# Altium PCB Karta_ILS.PCBDOC (part 1 of 9)
Units mm, origin at the board's own origin, x right, y up, seen from the top; angles counter-clockwise.
Board outline 70 x 83.2 mm, 6 copper layers (TopLayer, Layer 1, Layer 2, Layer 3, Layer 4, Bottom Layer), stack 0.914 mm thick; 406 components, 271 nets, 1327 pads, 719 vias.
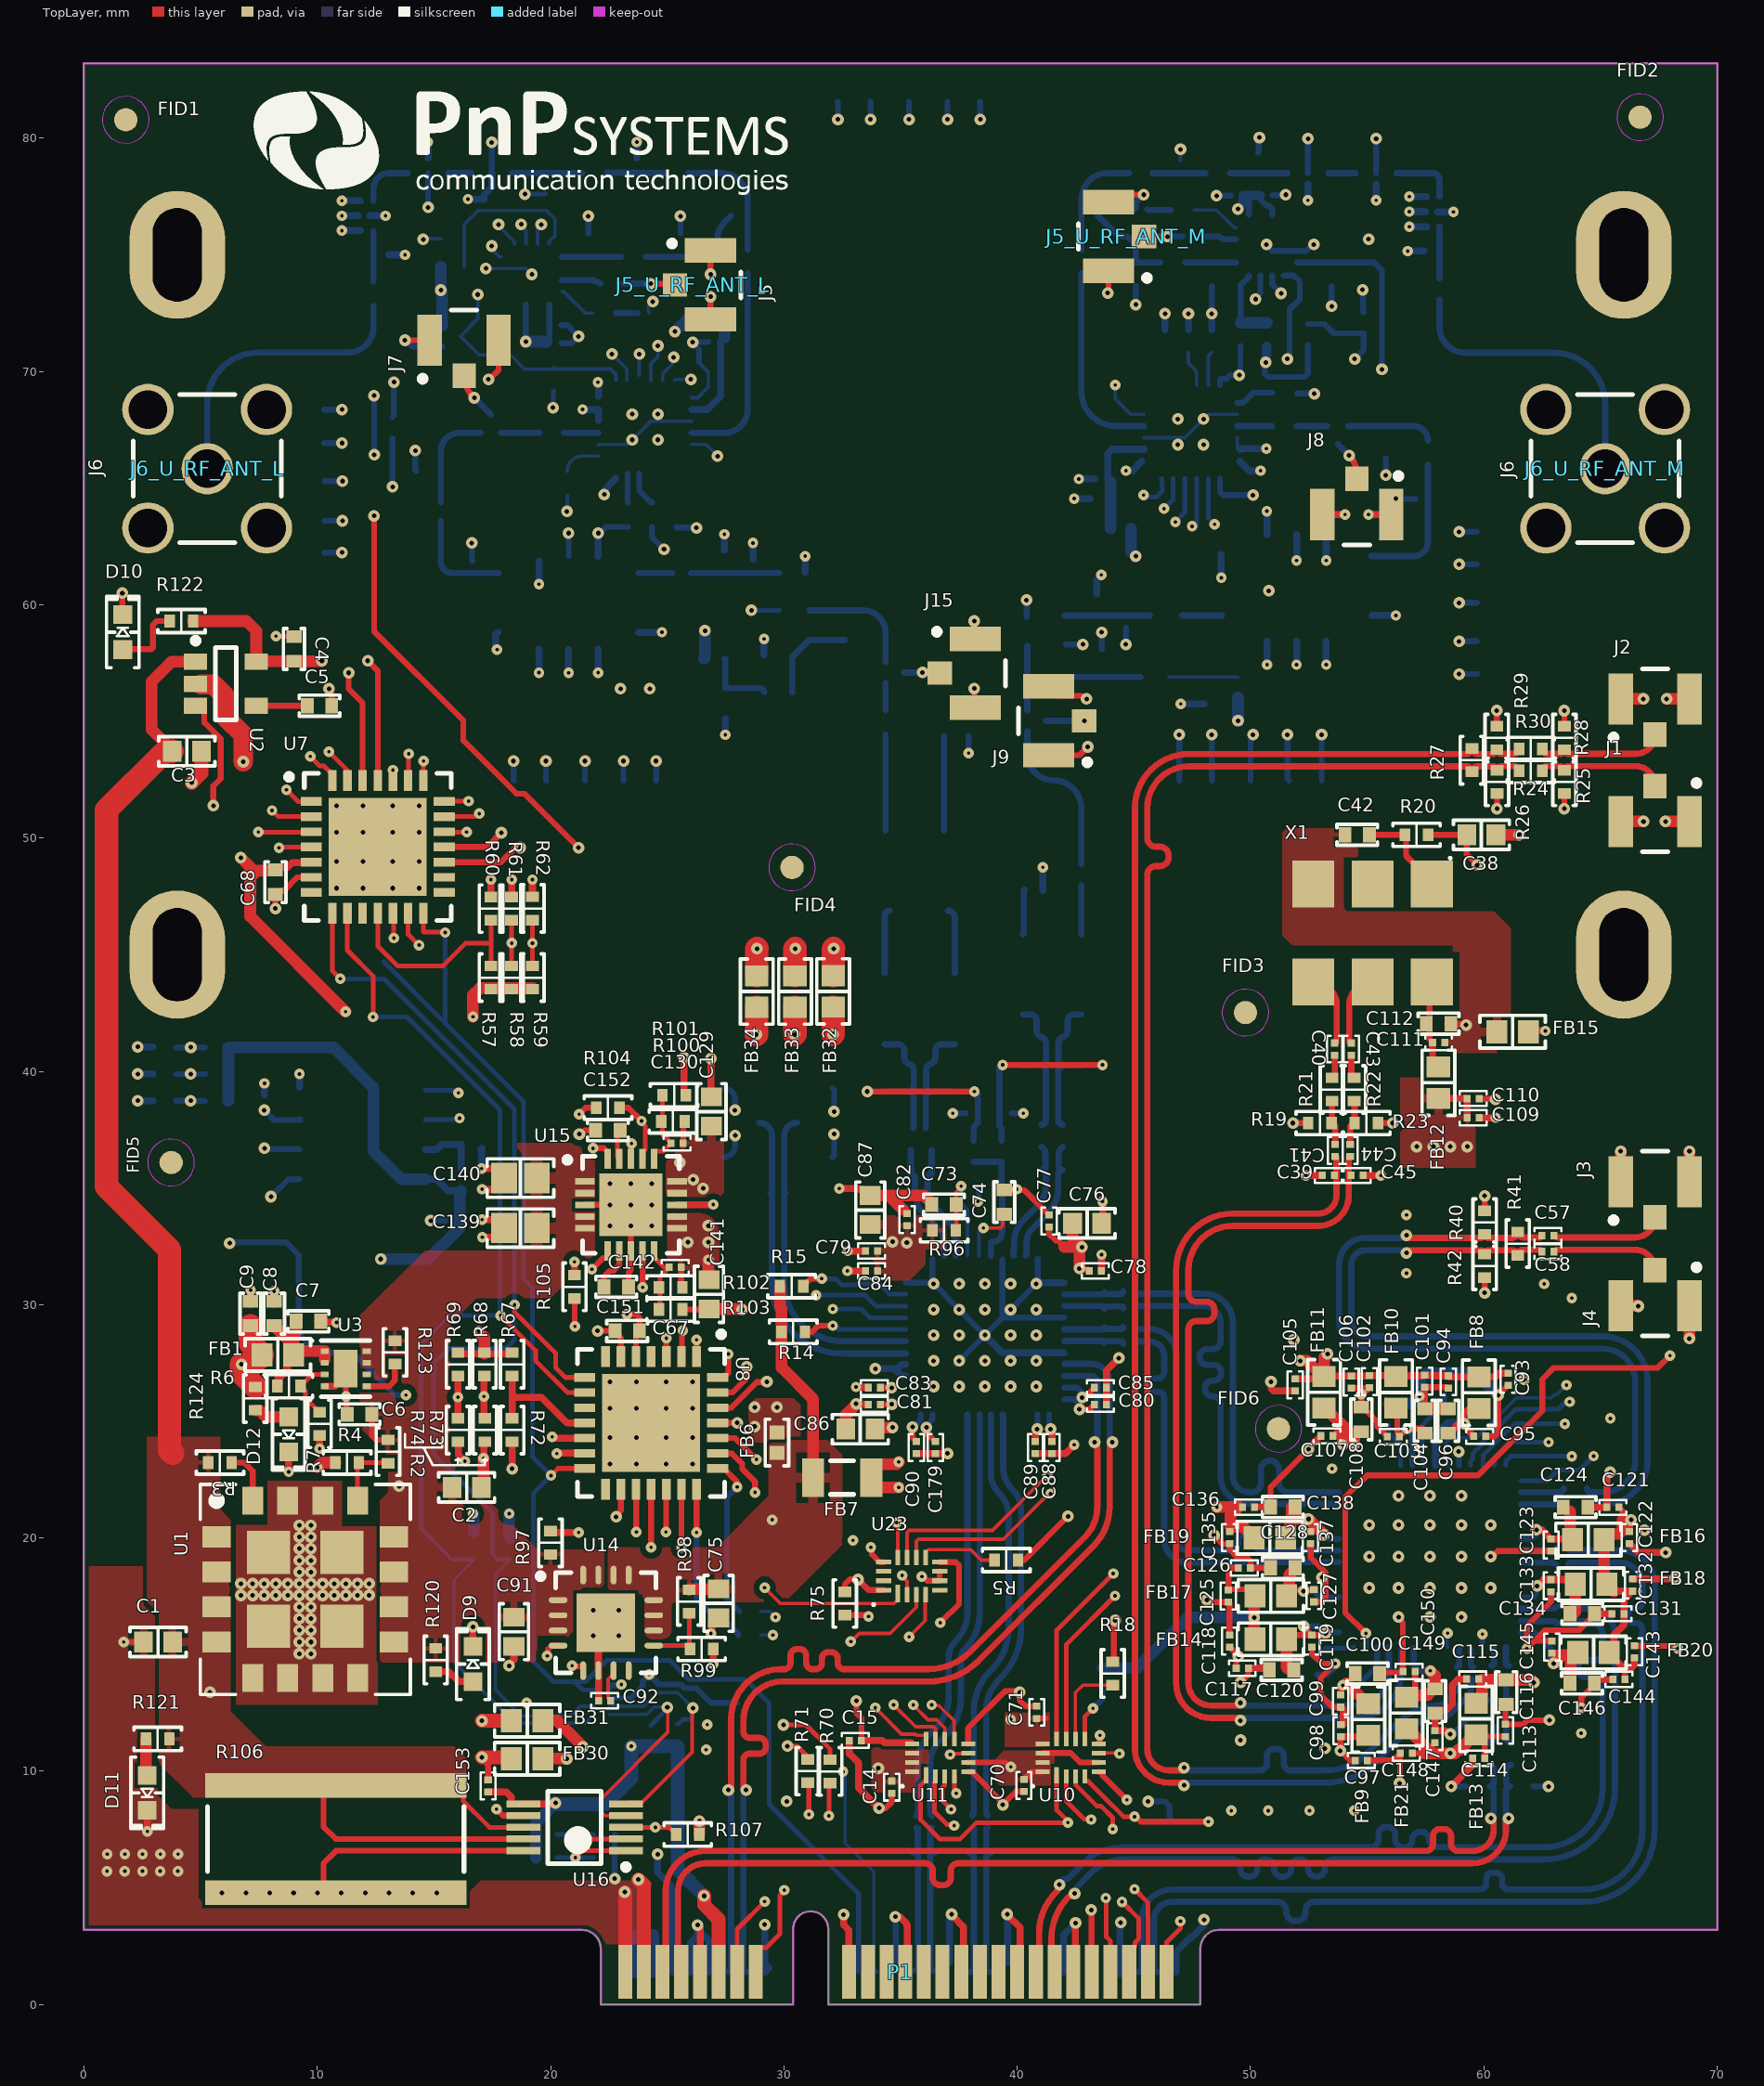
[diagram p0: TopLayer view]
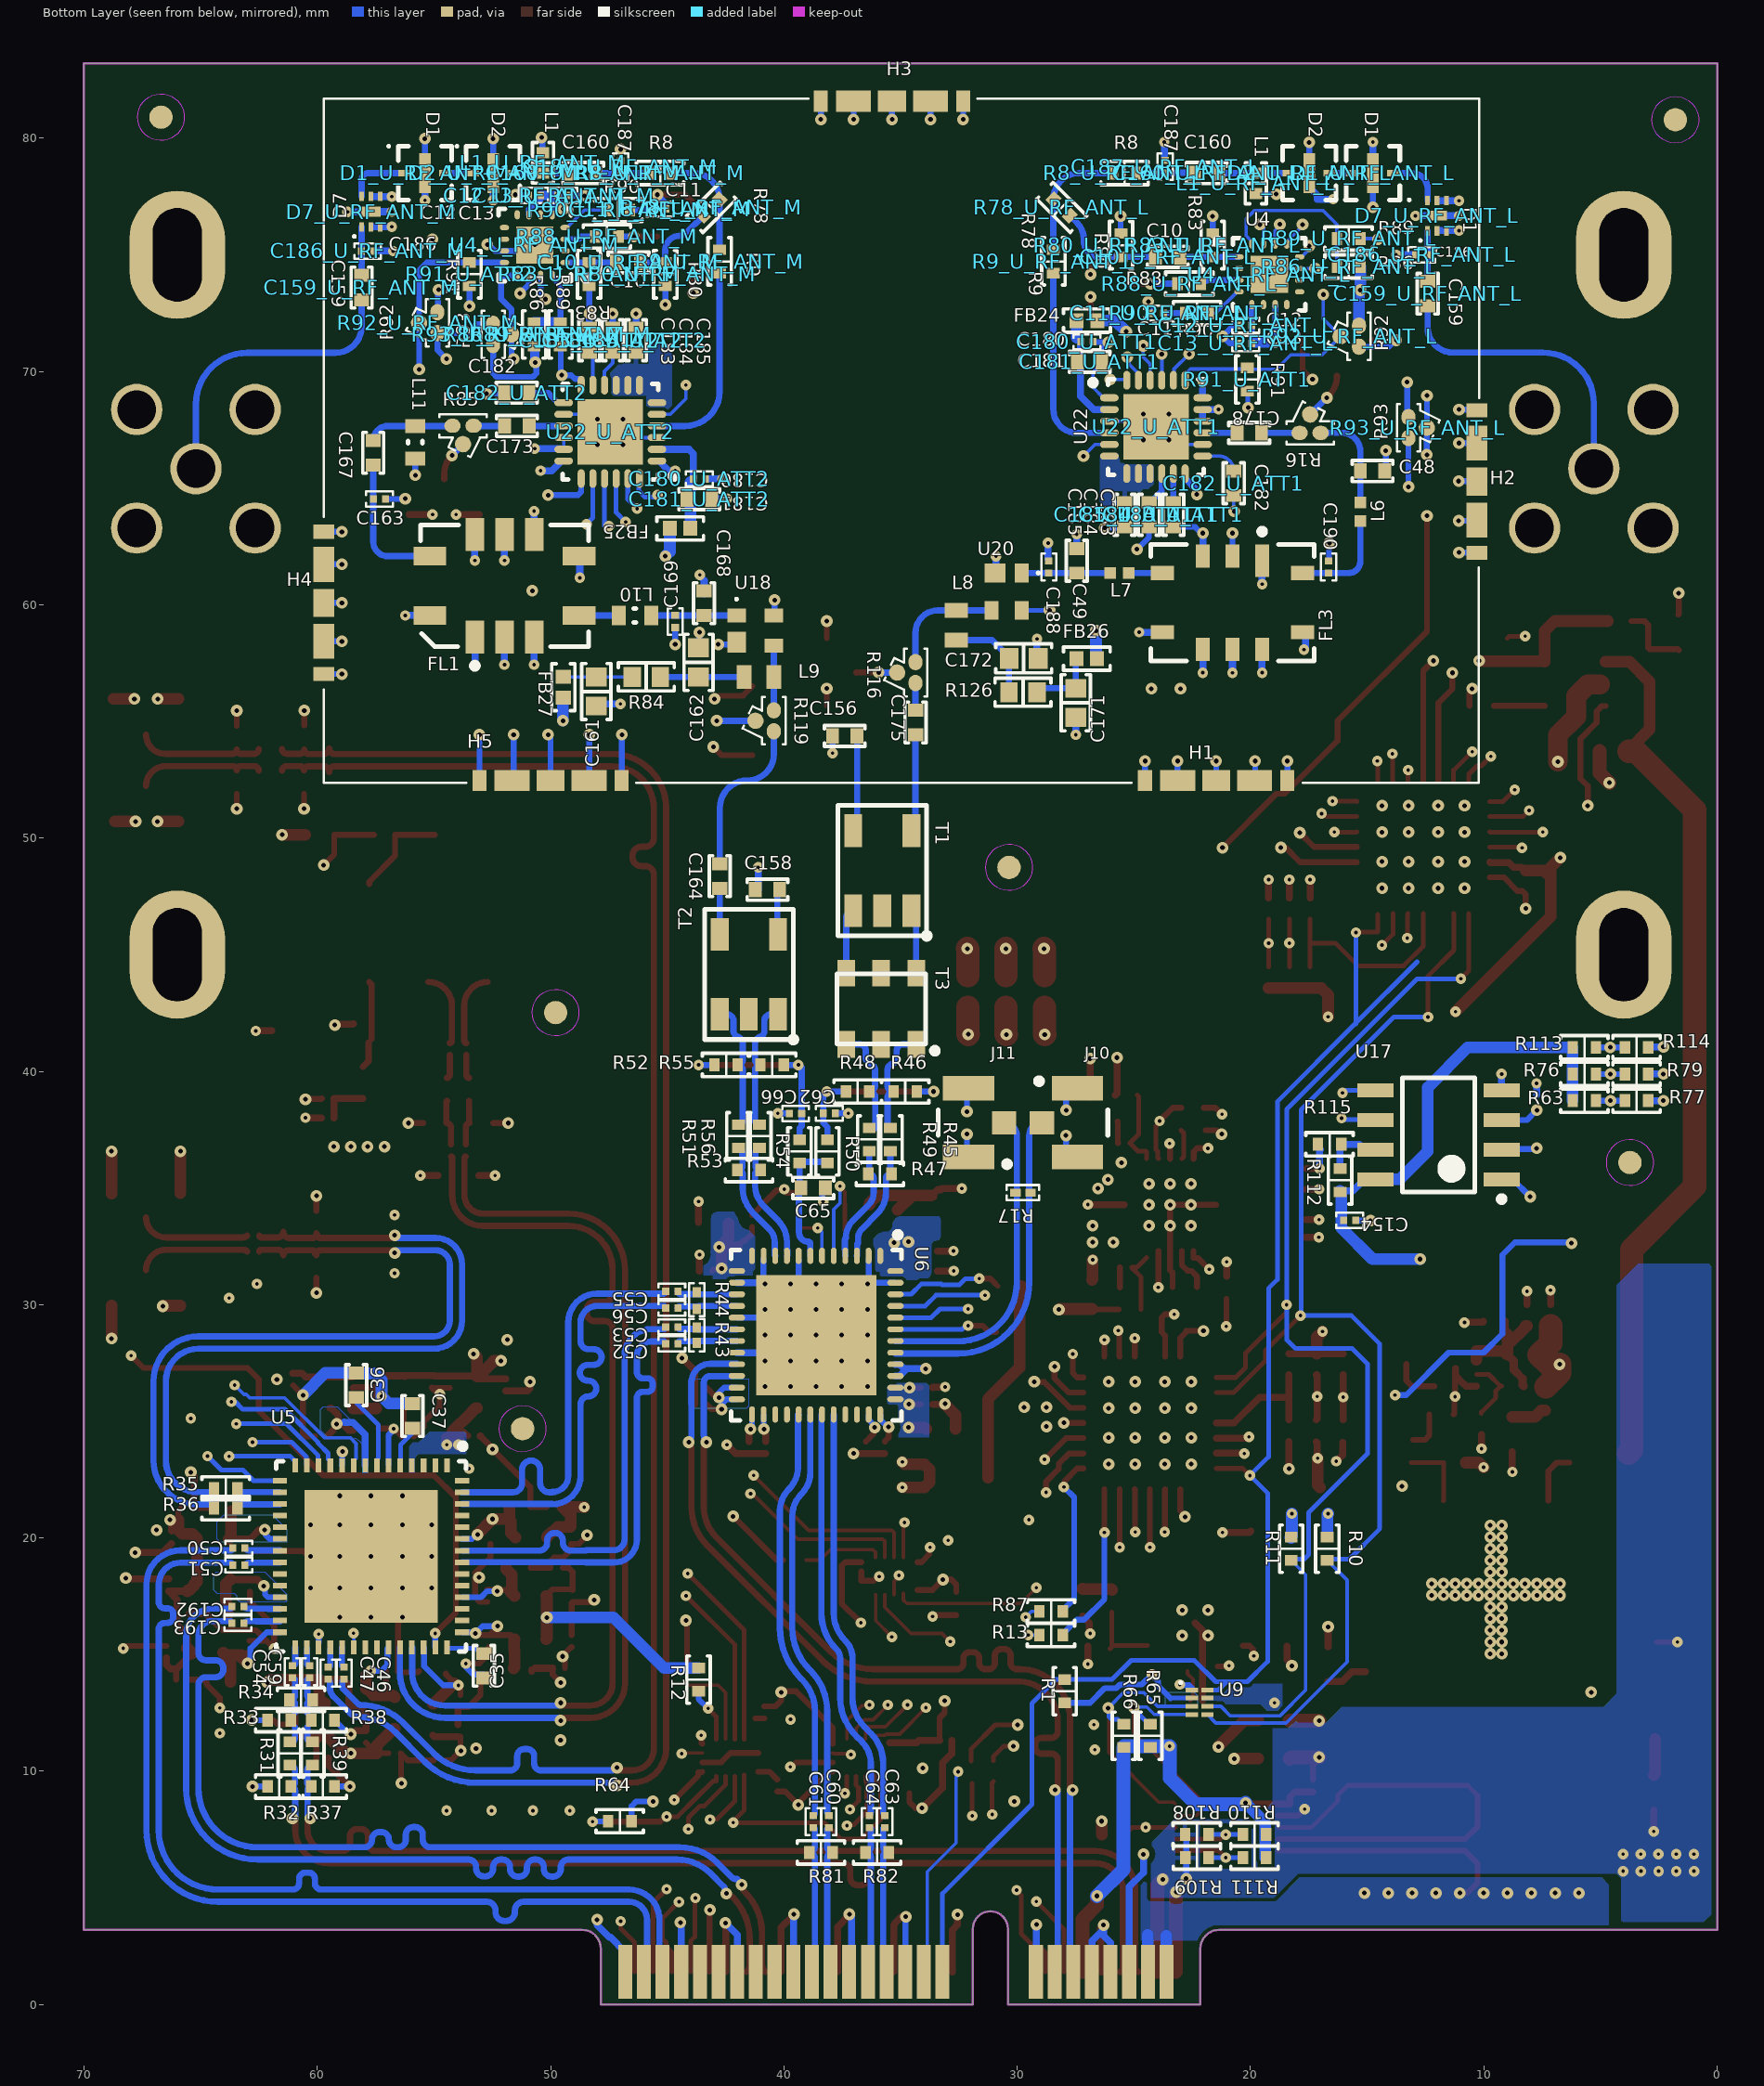
[diagram p1: Bottom Layer view, seen from below]
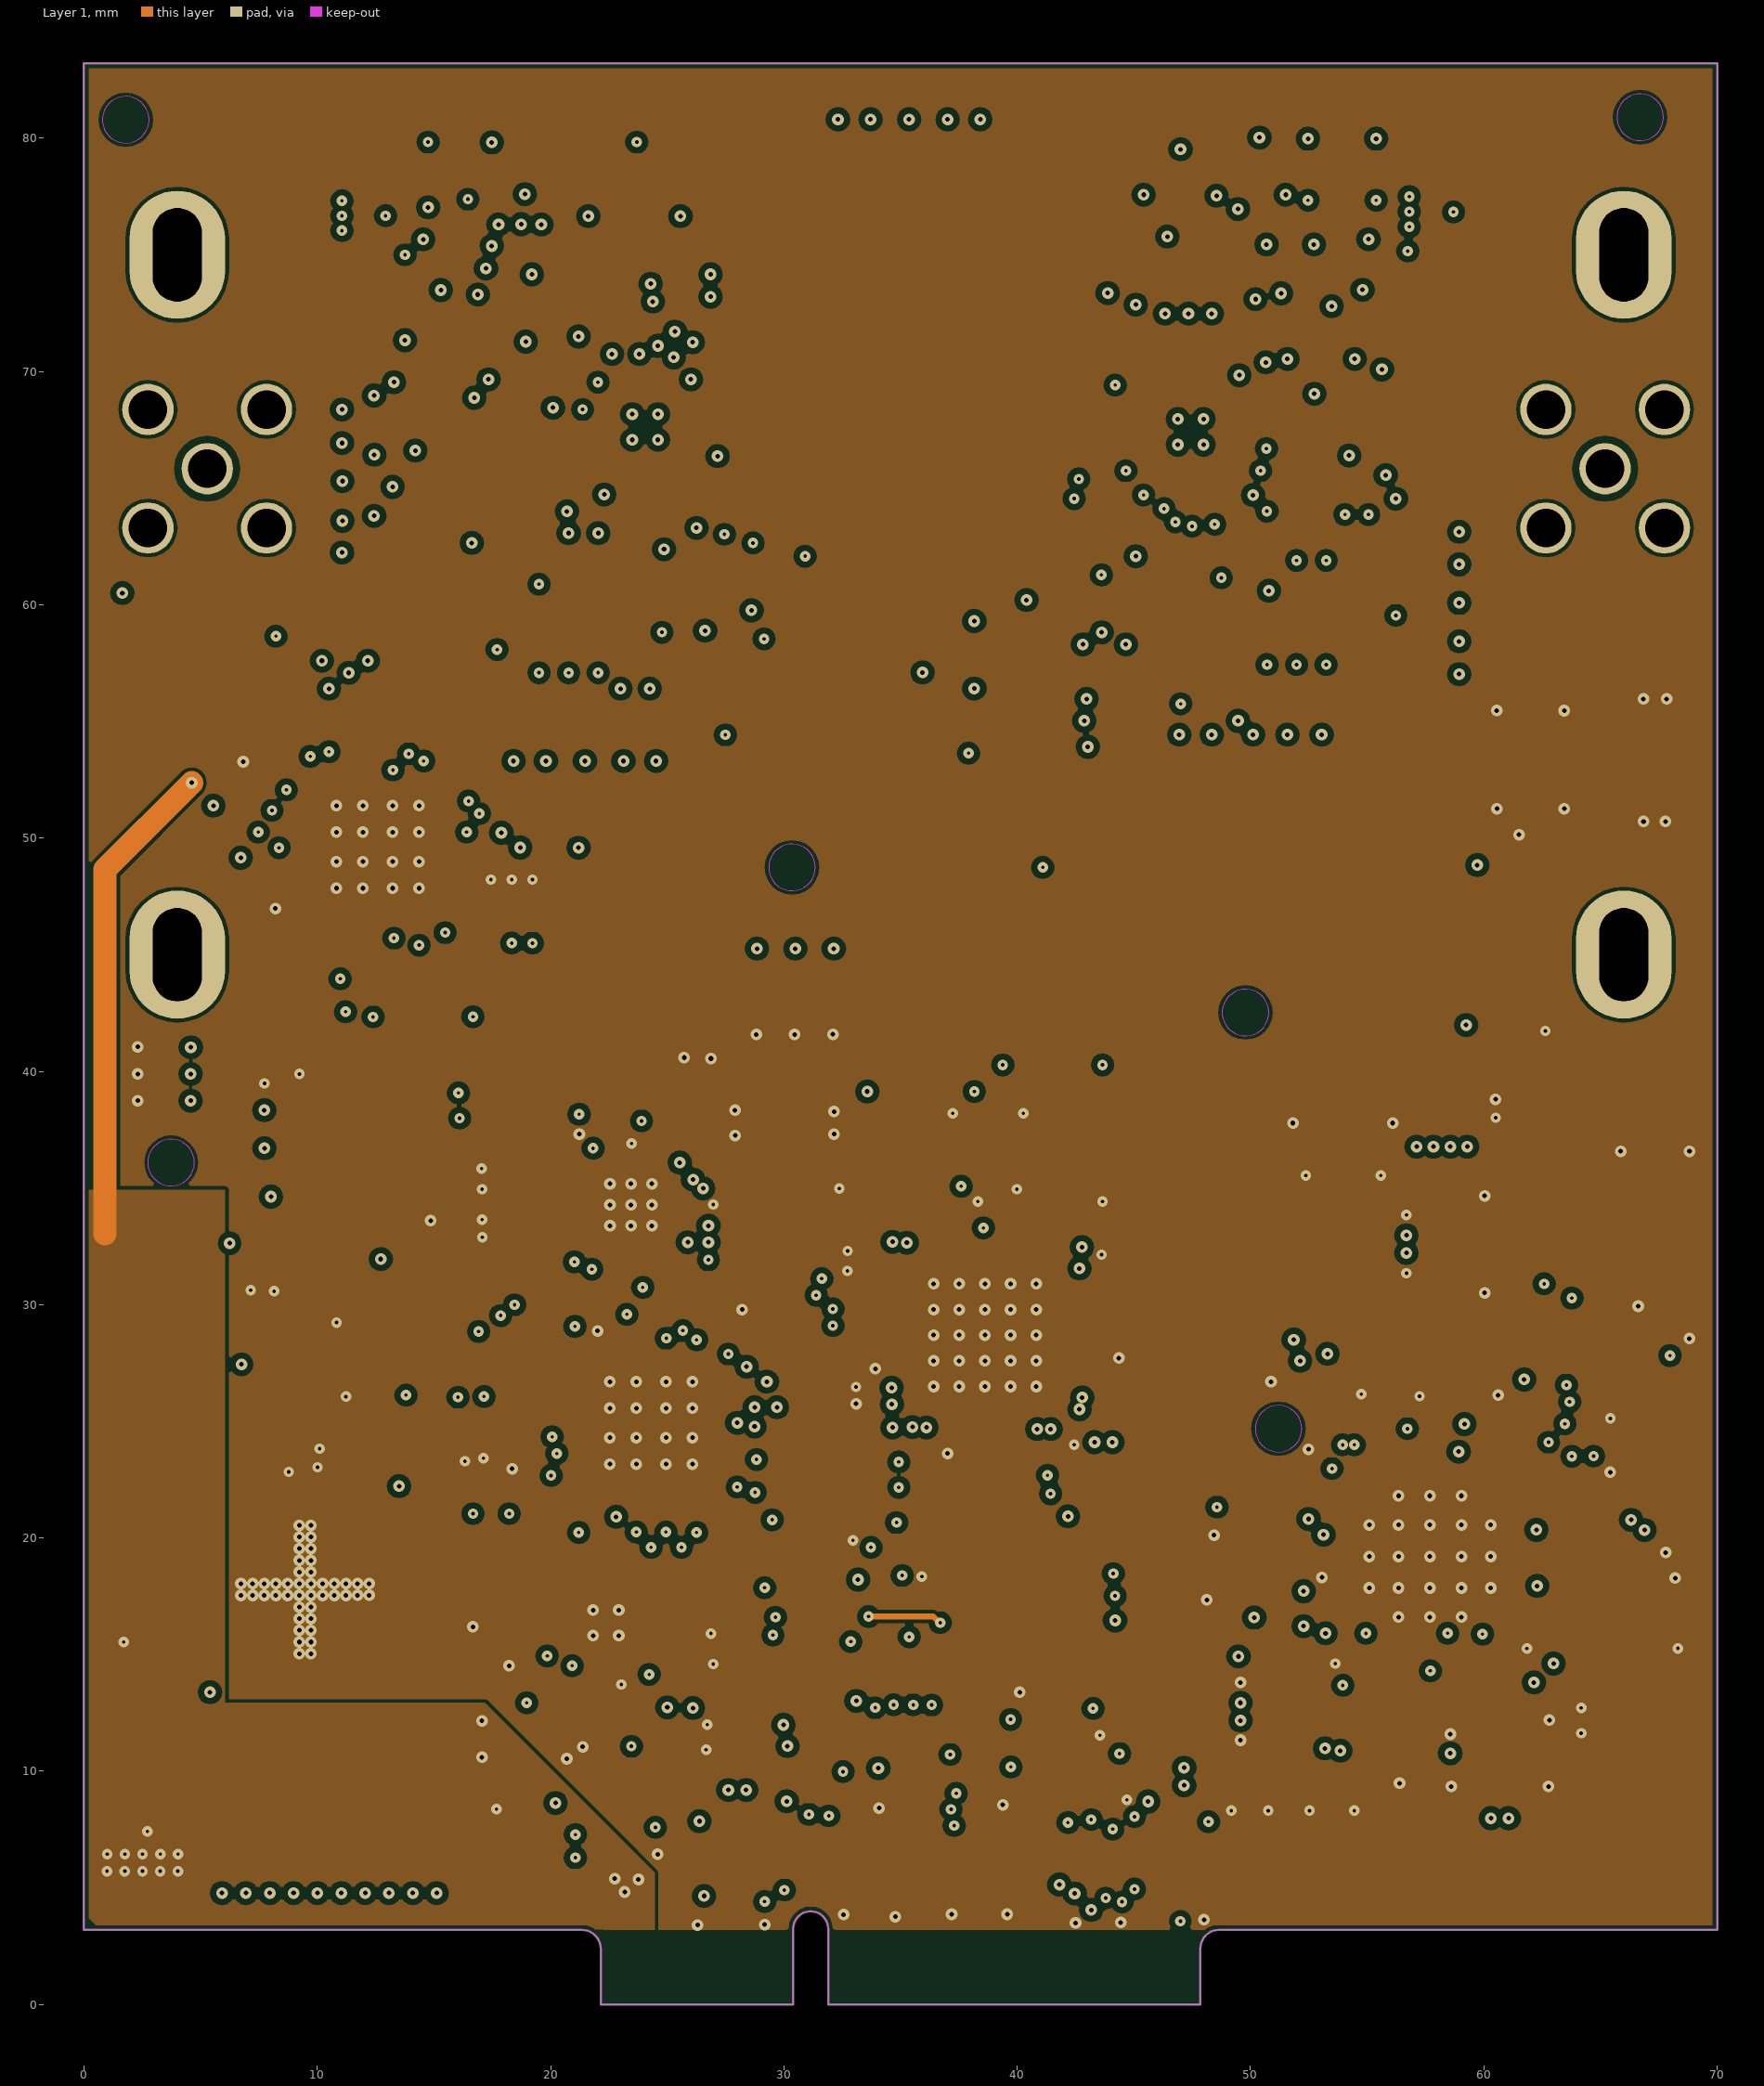
[diagram p2: Layer 1]
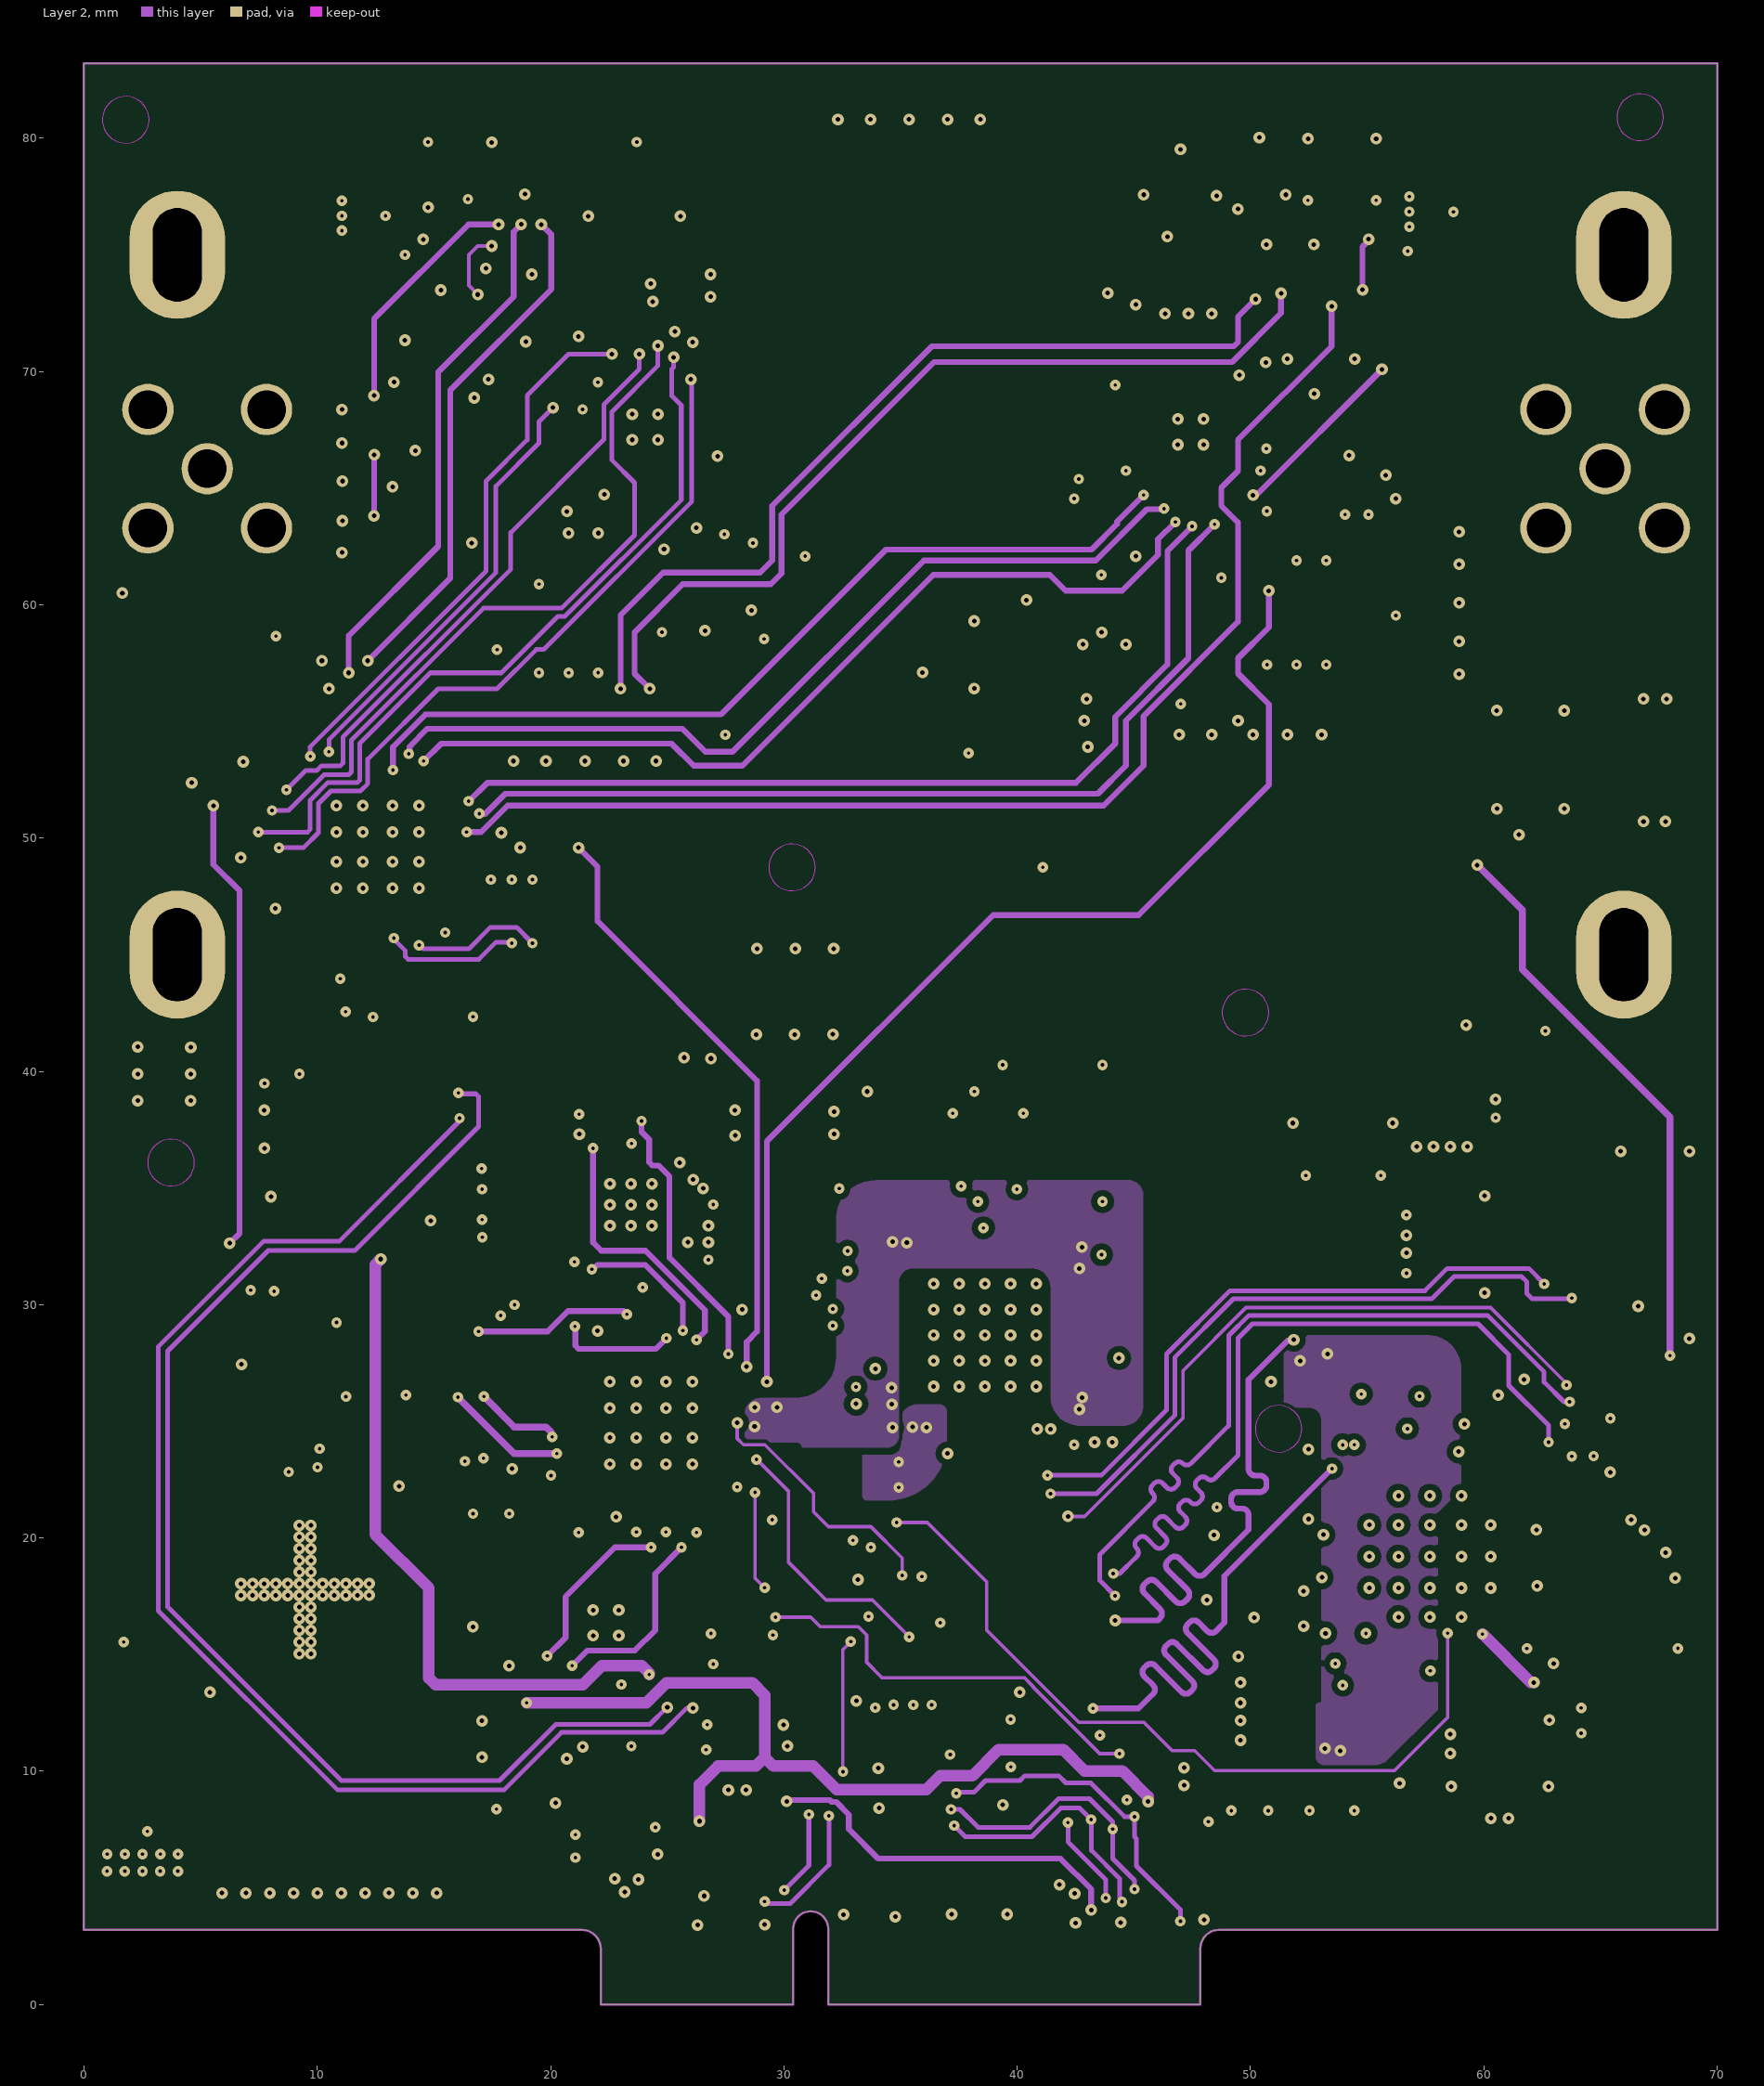
[diagram p3: Layer 2]
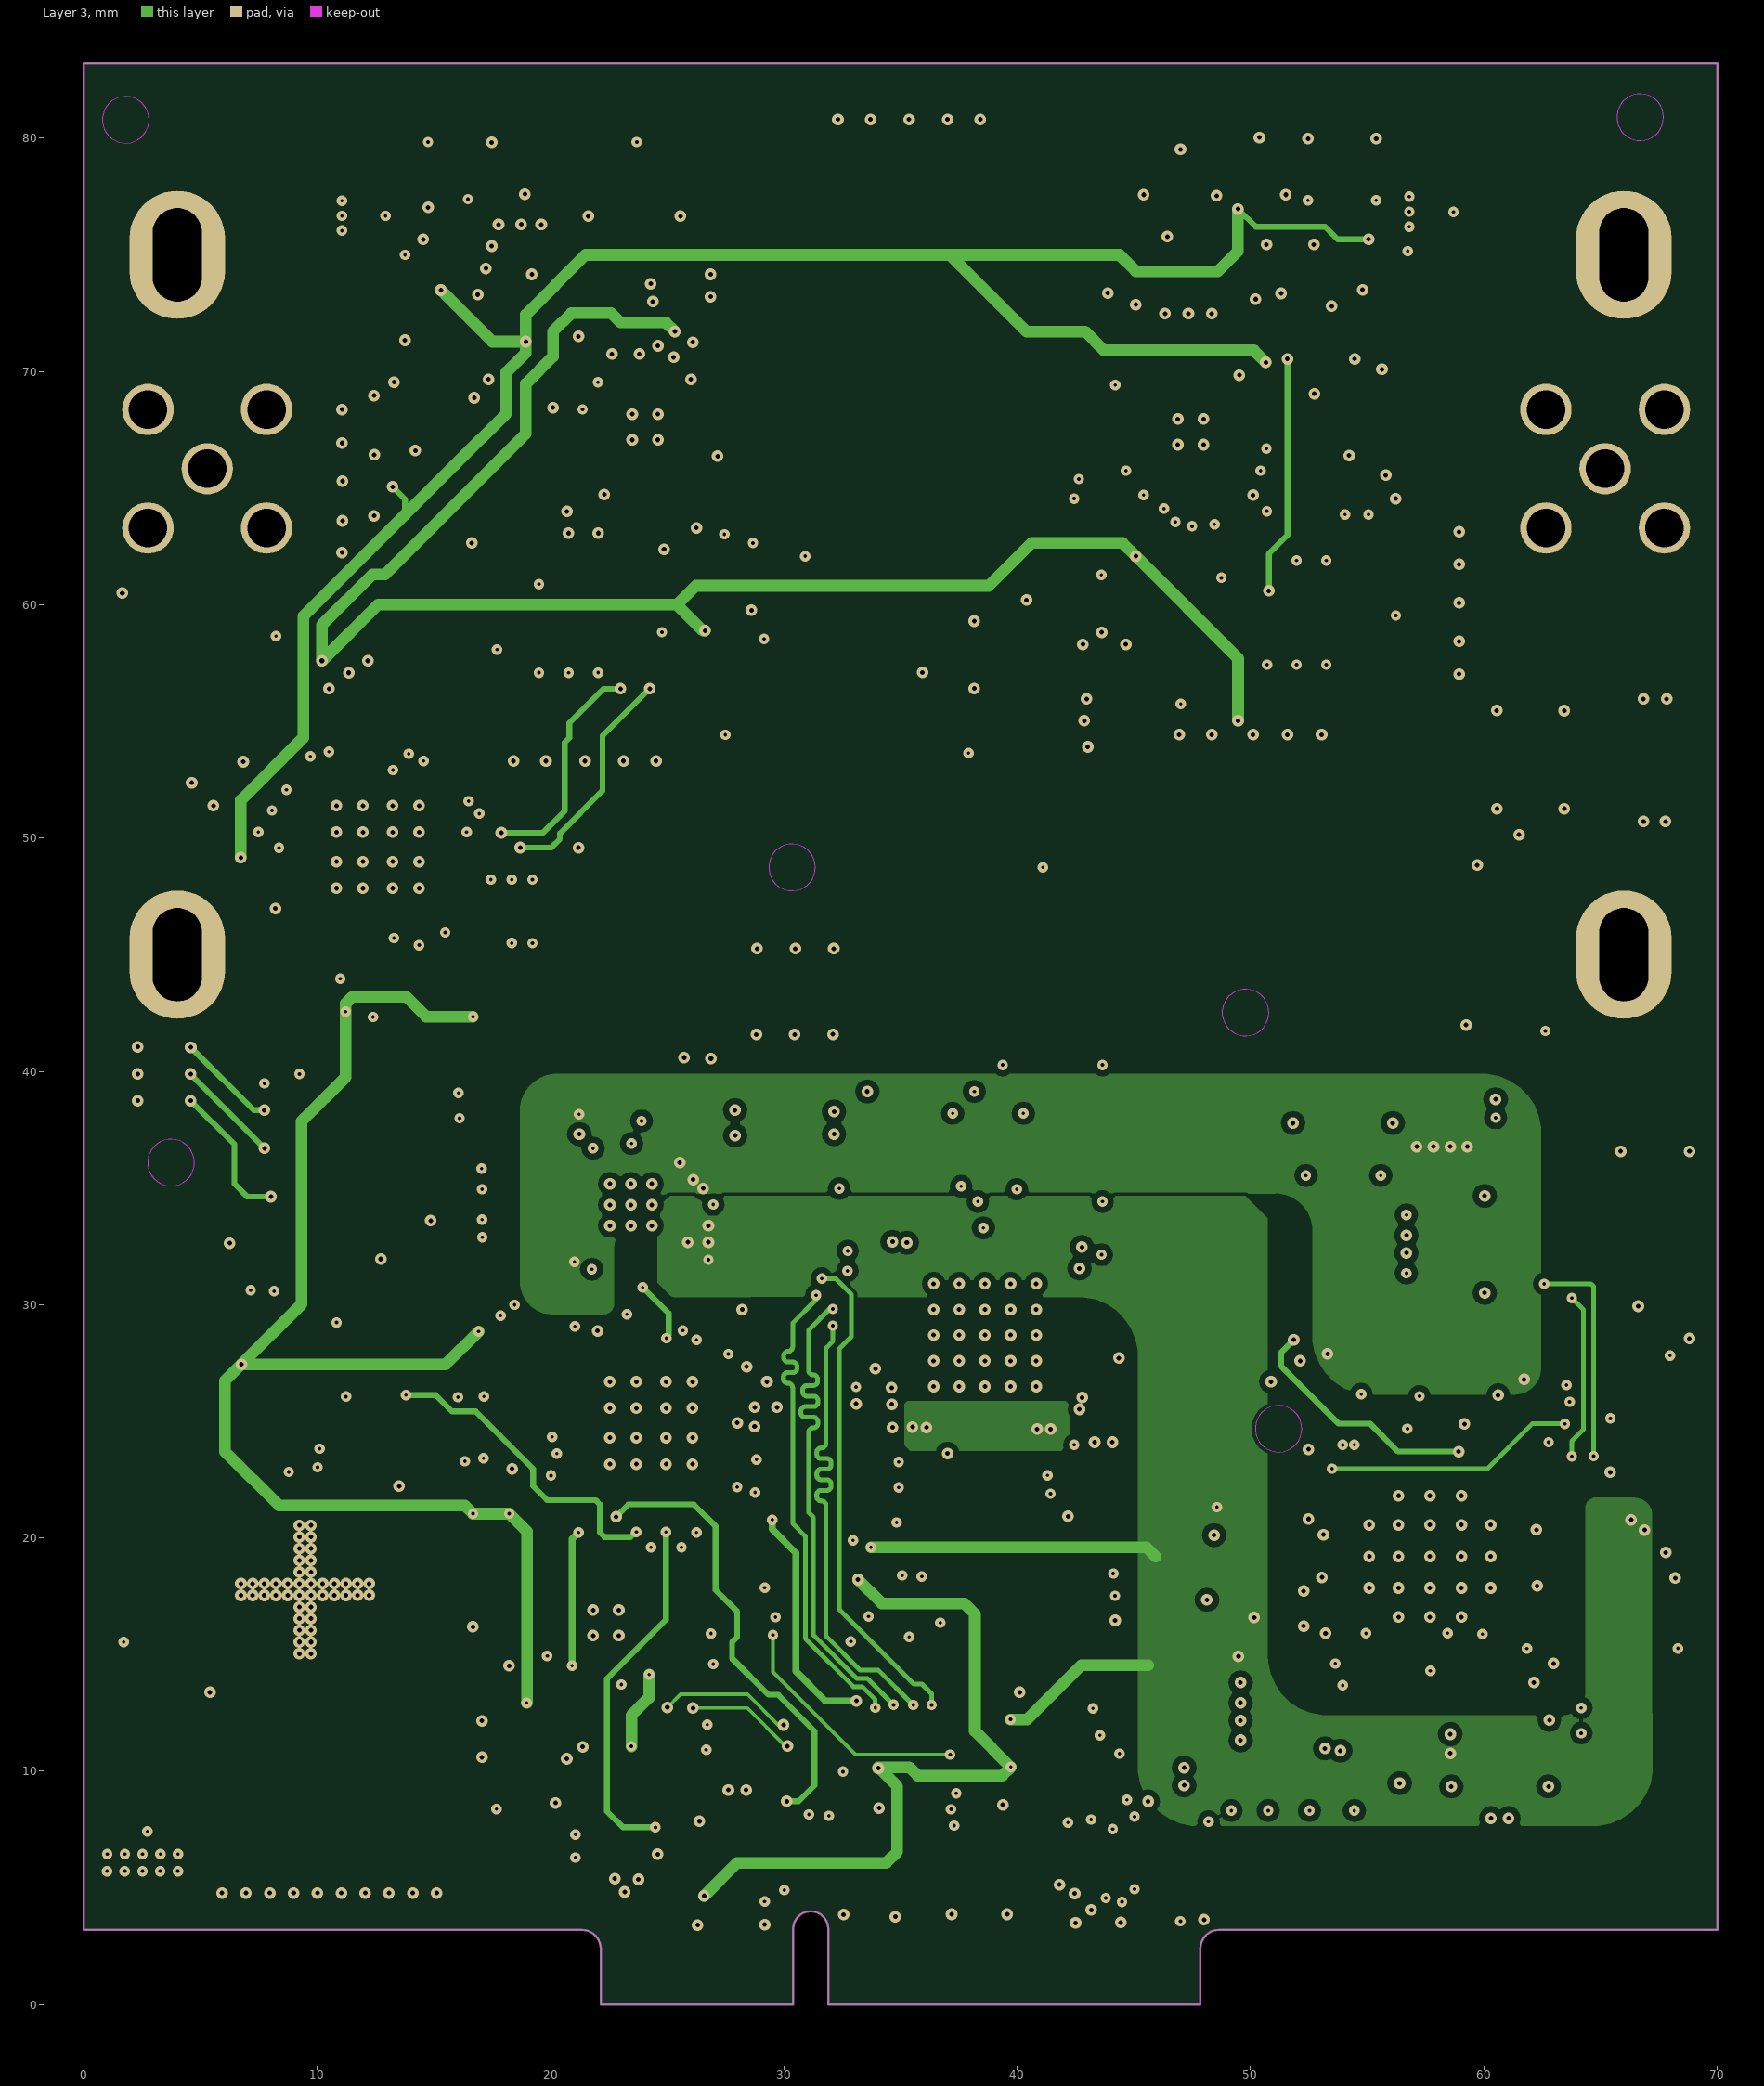
[diagram p4: Layer 3]
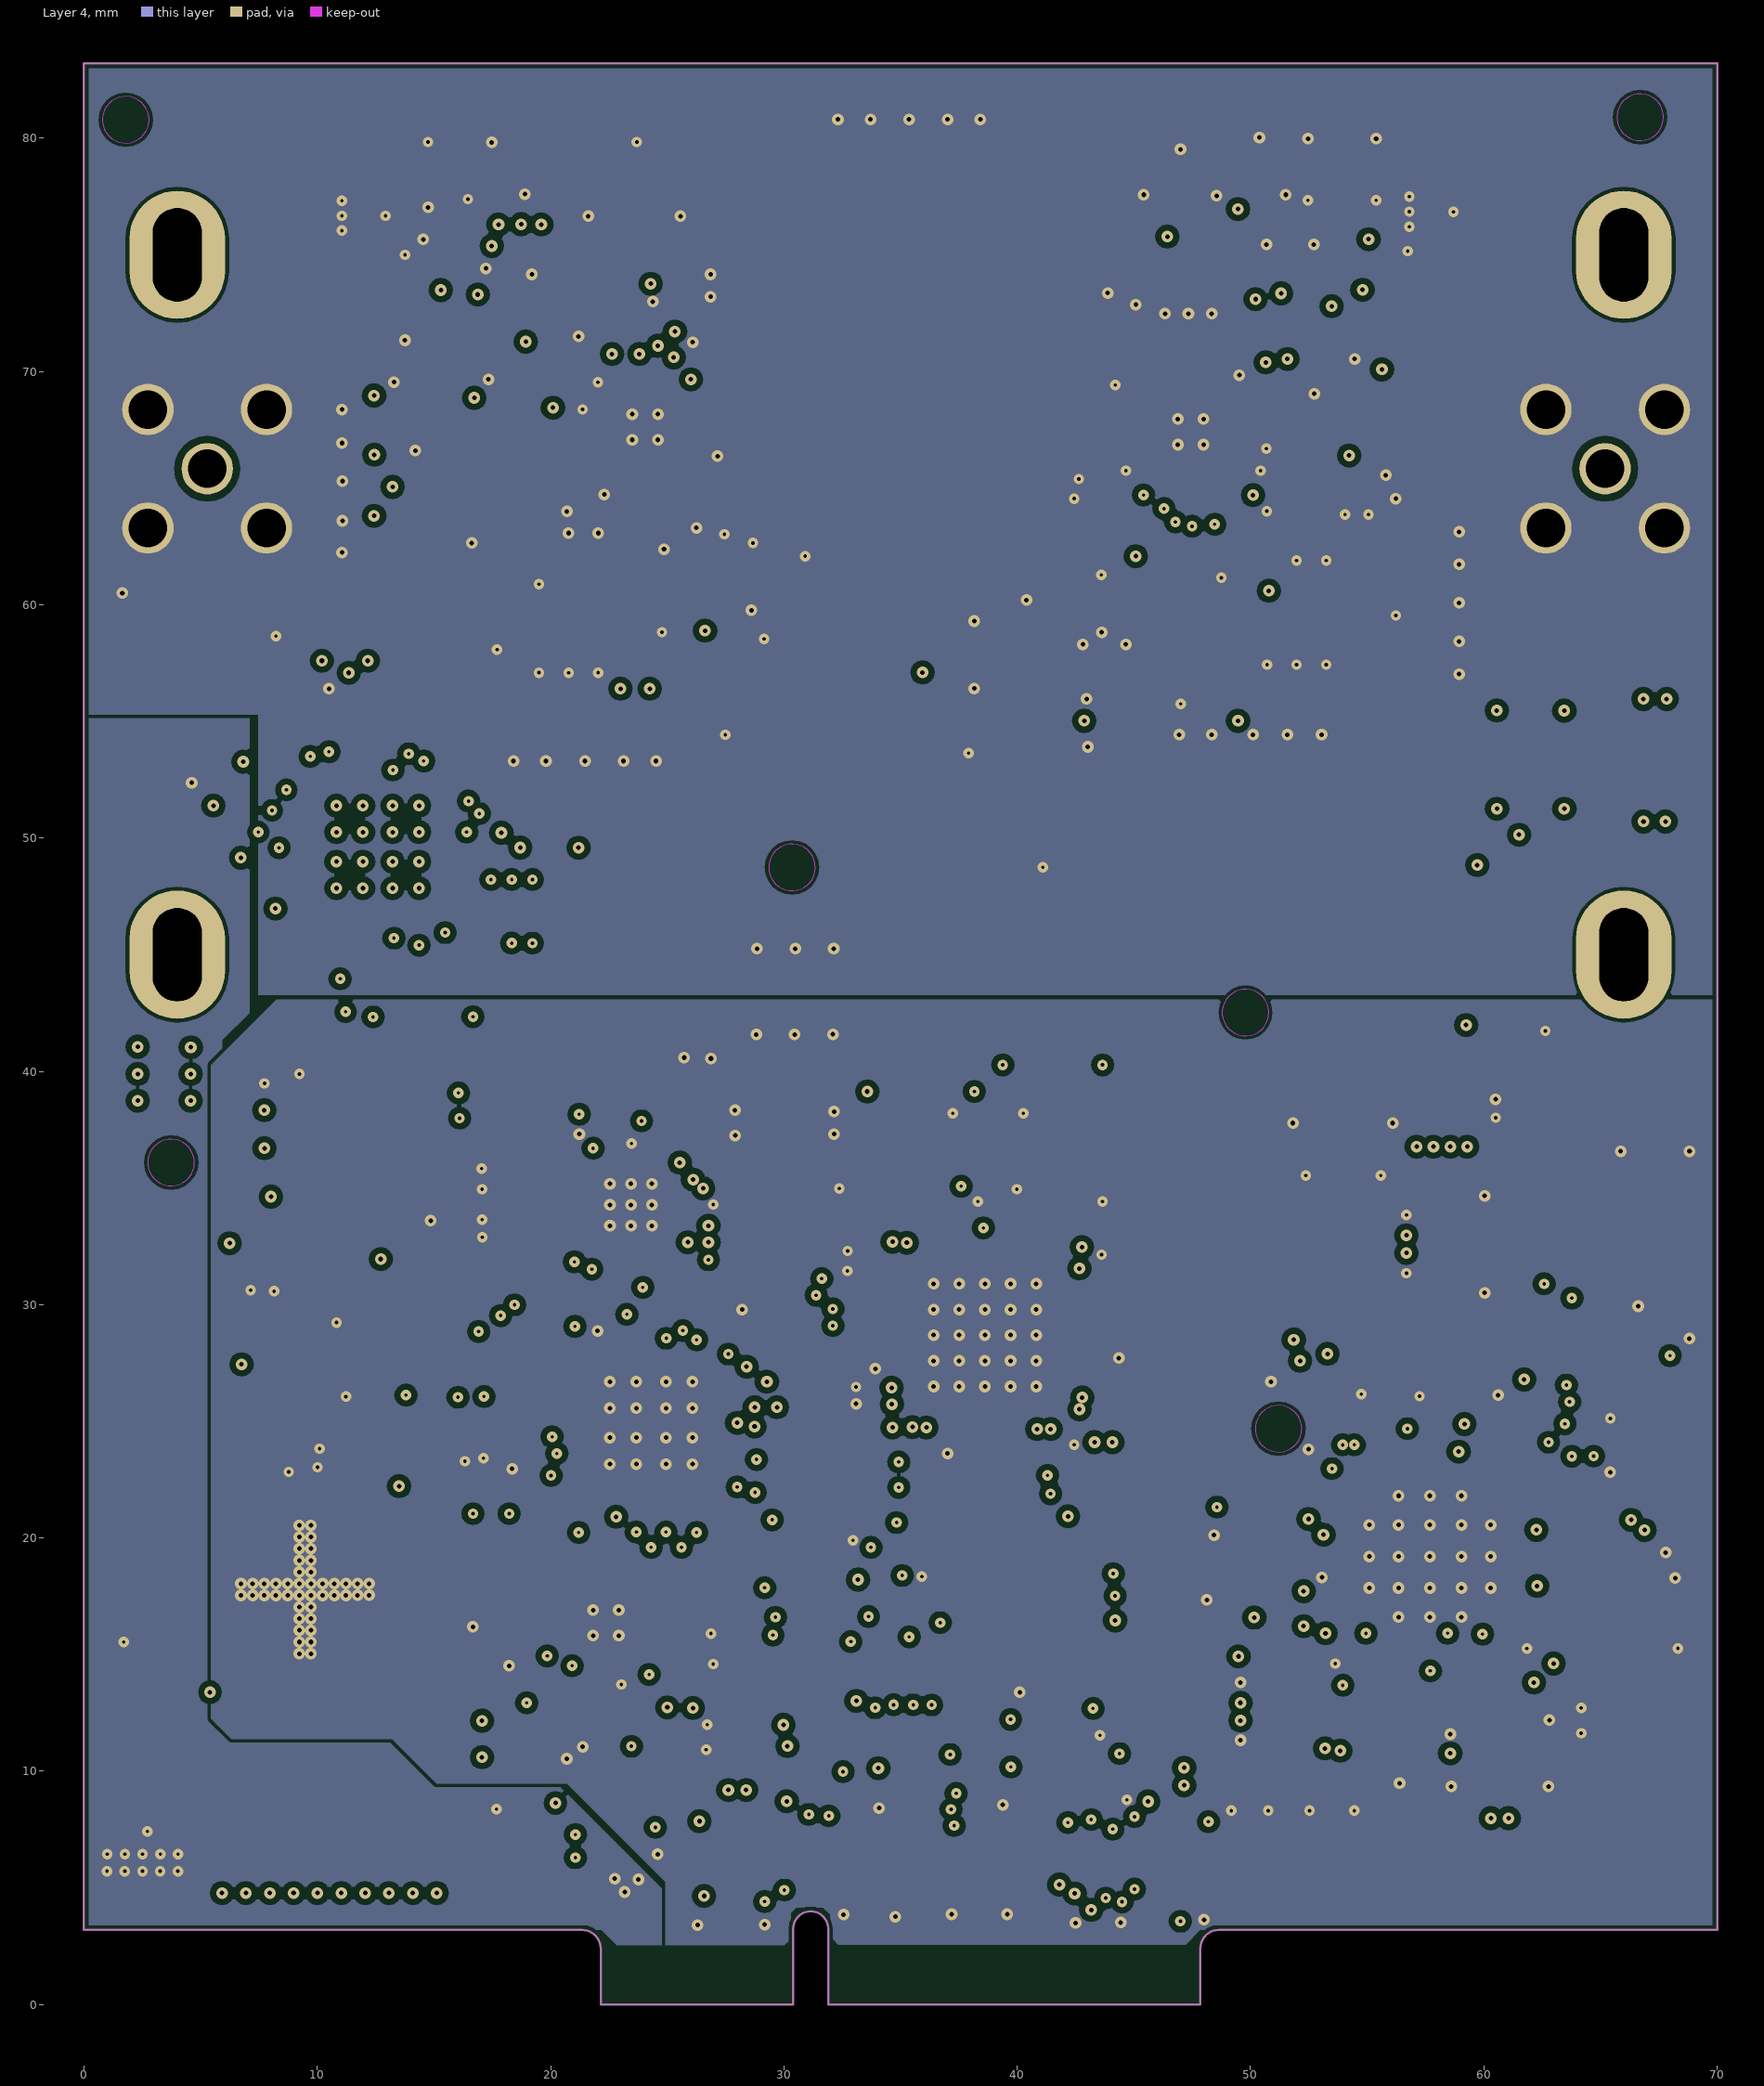
[diagram p5: Layer 4]

## Layer stack, top to bottom
TopSolder: solder mask 0.01, Solder Resist, Dk 3.5
TopLayer: signal copper 0.017
Dielectric1: prepreg 0.16, PP-008, Dk 4.29
Layer 1: signal copper 0.053
Dielectric 2: core 0.094, Core-009, Dk 3.96
Layer 2: signal copper 0.053
Dielectric2: prepreg 0.16, PP-016, Dk 4.29
Layer 3: signal copper 0.053
Dielectric 3: core 0.094, Core-009, Dk 3.96
Layer 4: signal copper 0.053
Dielectric 1: prepreg 0.16, PP-008, Dk 4.29
Bottom Layer: signal copper 0.017
Bottom Solder: solder mask 0.01, Solder Resist, Dk 3.5

## Board outline
22.15,2.4 ccw(c21.35,2.4) 21.35,3.2 0,3.2 0,83.2 70,83.2 70,3.2 48.65,3.2 ccw(c48.65,2.4) 47.85,2.4 47.85,0 31.9,0 31.9,3.25 ccw(c31.15,3.25) 30.4,3.25 30.4,0 22.15,0

## Design rules (kind name [scope] priority, off if disabled: settings)
Clearance Clearance_Via [IsVia] p1: gap=0.1 ignorepadtopadclearanceinfootprint=FALSE except(0.26: Arc-Via Track-Via Via-Via Via-Fill Via-Poly Via-Region; 0.5: Arc-Arc Arc-Track Track-Track)
Clearance Clearance_diff [InAnyDifferentialPair] p2: gap=0.5 ignorepadtopadclearanceinfootprint=TRUE except(0.2: Arc-Arc Arc-Track Arc-SMDPad Track-Track Track-SMDPad SMDPad-SMDPad; 0.26: Via-Via Via-Fill Via-Poly Via-Region)
Clearance Clearance_50 [InNetClass('Single50')] p3: gap=0.3 ignorepadtopadclearanceinfootprint=TRUE except(0.15: Arc-SMDPad Track-SMDPad; 0.25: Arc-Arc Arc-Track Track-Track)
Clearance "Clearance_Edge Connector" [(InComponentClass('Edge Connector')) vs (InComponentClass('Edge Connector'))] p4: gap=0.2 ignorepadtopadclearanceinfootprint=FALSE except(0: Arc-Hole Track-Hole SMDPad-Hole THPad-Hole Via-Hole Fill-Hole Poly-Hole Region-Hole Text-Hole)
Clearance [All] p5: gap=0.15 ignorepadtopadclearanceinfootprint=FALSE
DiffPairsRouting Diff_100 [InDifferentialPairClass('Diff_100')] p1: maxlimit=0.26 minlimit=0.23 mostfreqgap=0.254 toplayer_mingap=0.26 toplayer_prefgap=0.26 toplayer_minwidth=0.268 toplayer_maxwidth=0.268 toplayer_prefwidth=0.268 bottomlayer_mingap=0.26 bottomlayer_prefgap=0.26 bottomlayer_minwidth=0.268 bottomlayer_maxwidth=0.268 bottomlayer_prefwidth=0.268 impedanceprofiledriven=TRUE impedanceprofileid={4EC12C71-731A-4A04-9E39-5B54F8BA15AE} impedanceprofilevalue=100.000000 maxuncoupledlength=12.7
FabricationTestPointUsage TestPointUsage [All] p1: valid=0 allowmultiple=FALSE
FabricationTestpoint Testpoint [All] p1: side=3 testpointundercomponent=TRUE minsize=1.016 maxsize=2.54 preferedsize=1.524 minholesize=0.508 maxholesize=1.016 preferedholesize=0.813 testpointgrid=0.025 allowsidetop=TRUE allowsidebottom=TRUE usegrid=TRUE gridtolerance=0
Height "PCI Express Mini, \"Component height constraints\", Page 18, bottom side" [OnBottomLayer] p1: minheight=0 maxheight=3.3 prefheight=3.3
Height "PCI Express Mini, \"Component height constraints\", Page 18, top side" [OnTopLayer] p2: minheight=0 maxheight=4 prefheight=4
Length ADC_CLK_SYS_DISTR [InDifferentialPair('CLKout10') or InDifferentialPair('CLKout8')] p1: maxlimit=18.5 minlimit=17.5
Length FPGA_CLK [InNetClass('FPGA_CLK')] p2: maxlimit=42 minlimit=41
Length ADC_DATA_OUT_TO_CAP_1 [InDifferentialPair('CMLOUT_AC') or InDifferentialPair('CMLOUT_BC')] p3: maxlimit=17.9 minlimit=17.2
MatchedLengths MatchedLengths_CLK [InDifferentialPair('LMK_OSC_IN') or InDifferentialPair('CLKout1_C') or InDifferentialPair('CLKin0P') or InDifferentialPair('CLKin1') or InDifferentialPair('0F')] p1: tolerance=1 checknetsindiffpair=TRUE checkdiffpairvsdiffpair=FALSE checkxsignals=FALSE checkothers=FALSE
MatchedLengths [InNetClass('FPGA_CLK')] p2: tolerance=1 checknetsindiffpair=TRUE checkdiffpairvsdiffpair=FALSE checkxsignals=FALSE checkothers=FALSE
MatchedLengths DiffPair_ADC_TO_FPGA [InNetClass('Data_OUT_TO FPGA')] p3: tolerance=0.381 checknetsindiffpair=TRUE checkdiffpairvsdiffpair=FALSE checkxsignals=FALSE checkothers=FALSE
MatchedLengths DiffPair_ADC [InNetClass('Data_OUT_TO_CAP')] p4: tolerance=0.5 checknetsindiffpair=TRUE checkdiffpairvsdiffpair=FALSE checkxsignals=FALSE checkothers=FALSE
PlaneClearance [All] p1: clearance=0.5
PlaneConnect [All] p1: planeconnectstyle=Direct reliefexpansion=0.508 reliefentries=4 reliefconductorwidth=0.254 reliefairgap=0.254
PolygonConnect "Connect Res0201" [HasFootprint('RES 0201/0603')] p1: thpad.connectstyle=Direct thpad.reliefconductorwidth=0.254 thpad.reliefentries=4 thpad.polygonreliefangle="90 Angle" thpad.airgapwidth=0.254 smdpad.connectstyle=Relief smdpad.reliefconductorwidth=0.2 smdpad.reliefentries=4 smdpad.polygonreliefangle="90 Angle" smdpad.airgapwidth=0.2 via.connectstyle=Direct via.reliefconductorwidth=0.254 via.reliefentries=4 via.polygonreliefangle="90 Angle" via.airgapwidth=0.254
PolygonConnect "Connect DCDC" [HasFootprint('LGA-16EP')] p2: connectstyle=Direct reliefconductorwidth=0.254 reliefentries=4 polygonreliefangle="90 Angle" airgapwidth=0.254
PolygonConnect "Connect CAP0201" [HasFootprint('CAP 0201/0603 KK')] p3: thpad.connectstyle=Direct thpad.reliefconductorwidth=0.254 thpad.reliefentries=4 thpad.polygonreliefangle="90 Angle" thpad.airgapwidth=0.254 smdpad.connectstyle=Relief smdpad.reliefconductorwidth=0.2 smdpad.reliefentries=4 smdpad.polygonreliefangle="90 Angle" smdpad.airgapwidth=0.2 via.connectstyle=Direct via.reliefconductorwidth=0.254 via.reliefentries=4 via.polygonreliefangle="90 Angle" via.airgapwidth=0.254
PolygonConnect "Connect CAP0402" [HasFootprint('CAP 0402/1005 RF KK')] p4: thpad.connectstyle=Direct thpad.reliefconductorwidth=0.254 thpad.reliefentries=4 thpad.polygonreliefangle="90 Angle" thpad.airgapwidth=0.254 smdpad.connectstyle=Relief smdpad.reliefconductorwidth=0.2 smdpad.reliefentries=4 smdpad.polygonreliefangle="90 Angle" smdpad.airgapwidth=0.2 via.connectstyle=Direct via.reliefconductorwidth=0.254 via.reliefentries=4 via.polygonreliefangle="90 Angle" via.airgapwidth=0.254
PolygonConnect "Connect CAP080" [HasFootprint('CAP 0805/2012 RF')] p5: thpad.connectstyle=Direct thpad.reliefconductorwidth=0.254 thpad.reliefentries=4 thpad.polygonreliefangle="90 Angle" thpad.airgapwidth=0.254 smdpad.connectstyle=Relief smdpad.reliefconductorwidth=0.5 smdpad.reliefentries=4 smdpad.polygonreliefangle="90 Angle" smdpad.airgapwidth=0.25 via.connectstyle=Direct via.reliefconductorwidth=0.254 via.reliefentries=4 via.polygonreliefangle="90 Angle" via.airgapwidth=0.254
PolygonConnect "Connect CAP0603" [HasFootprint('CAP 0603/1608 RF')] p6: thpad.connectstyle=Direct thpad.reliefconductorwidth=0.254 thpad.reliefentries=4 thpad.polygonreliefangle="90 Angle" thpad.airgapwidth=0.254 smdpad.connectstyle=Relief smdpad.reliefconductorwidth=0.35 smdpad.reliefentries=4 smdpad.polygonreliefangle="90 Angle" smdpad.airgapwidth=0.25 via.connectstyle=Direct via.reliefconductorwidth=0.254 via.reliefentries=4 via.polygonreliefangle="90 Angle" via.airgapwidth=0.254
PolygonConnect "Connect FB0603_1" [HasFootprint('FER 0603/1608 KK') or HasFootprint('FB0603')] p7: thpad.connectstyle=Direct thpad.reliefconductorwidth=0.254 thpad.reliefentries=4 thpad.polygonreliefangle="90 Angle" thpad.airgapwidth=0.254 smdpad.connectstyle=Relief smdpad.reliefconductorwidth=0.35 smdpad.reliefentries=4 smdpad.polygonreliefangle="90 Angle" smdpad.airgapwidth=0.25 via.connectstyle=Direct via.reliefconductorwidth=0.254 via.reliefentries=4 via.polygonreliefangle="90 Angle" via.airgapwidth=0.254
PolygonConnect "Connect FB0603" [HasFootprint('FB1206')] p8: thpad.connectstyle=Direct thpad.reliefconductorwidth=0.254 thpad.reliefentries=4 thpad.polygonreliefangle="90 Angle" thpad.airgapwidth=0.254 smdpad.connectstyle=Relief smdpad.reliefconductorwidth=0.45 smdpad.reliefentries=4 smdpad.polygonreliefangle="90 Angle" smdpad.airgapwidth=0.25 via.connectstyle=Direct via.reliefconductorwidth=0.254 via.reliefentries=4 via.polygonreliefangle="90 Angle" via.airgapwidth=0.254
PolygonConnect "Connect Res0402" [HasFootprint('RES 0402/1005 RF KK')] p9: thpad.connectstyle=Direct thpad.reliefconductorwidth=0.254 thpad.reliefentries=4 thpad.polygonreliefangle="90 Angle" thpad.airgapwidth=0.254 smdpad.connectstyle=Relief smdpad.reliefconductorwidth=0.2 smdpad.reliefentries=4 smdpad.polygonreliefangle="90 Angle" smdpad.airgapwidth=0.2 via.connectstyle=Direct via.reliefconductorwidth=0.254 via.reliefentries=4 via.polygonreliefangle="90 Angle" via.airgapwidth=0.254
PolygonConnect "Connect Res06031" [HasFootprint('RES 0603/1608 RF')] p10: thpad.connectstyle=Direct thpad.reliefconductorwidth=0.254 thpad.reliefentries=4 thpad.polygonreliefangle="90 Angle" thpad.airgapwidth=0.254 smdpad.connectstyle=Relief smdpad.reliefconductorwidth=0.35 smdpad.reliefentries=4 smdpad.polygonreliefangle="90 Angle" smdpad.airgapwidth=0.25 via.connectstyle=Direct via.reliefconductorwidth=0.254 via.reliefentries=4 via.polygonreliefangle="90 Angle" via.airgapwidth=0.254
PolygonConnect Power_Line1 [InNetClass('Power_Line')] p11 off: thpad.connectstyle=Direct thpad.reliefconductorwidth=0.254 thpad.reliefentries=4 thpad.polygonreliefangle="90 Angle" thpad.airgapwidth=0.254 smdpad.connectstyle=Relief smdpad.reliefconductorwidth=0.2 smdpad.reliefentries=4 smdpad.polygonreliefangle="90 Angle" smdpad.airgapwidth=0.2 via.connectstyle=Direct via.reliefconductorwidth=0.254 via.reliefentries=4 via.polygonreliefangle="90 Angle" via.airgapwidth=0.254
PolygonConnect [All] p12: connectstyle=Direct reliefconductorwidth=0.254 reliefentries=4 polygonreliefangle="90 Angle" airgapwidth=0.254
RoomDefinition "Component keep out area bottom" [Not (InComponentClass('Edge Connector'))] p1: confinementstyle=ConfineOut formatcopy=TRUE lockcomponents=FALSE outline 20,5.1 50,5.1 50,3.138 48.65,3.138 48.321,3.064 48.092,2.915 47.915,2.666 47.85,2.354 47.85,0 22.15,0 22.15,2.354 22.083,2.69 21.956,2.89 21.626,3.089 21.35,3.138 20,3.138
RoomDefinition "Component keep out area top" [Not (InComponentClass('Edge Connector'))] p2: confinementstyle=ConfineOut formatcopy=TRUE lockcomponents=FALSE outline 21.35,3.2 21.4,3.25 30.2,3.25 30.2,4.2 32.1,4.2 32.1,3.25 32.15,3.2 48.45,3.2 ccw(c48.45,2.888) 48.229,3.109 48.016,2.896 ccw(c48.417,2.494) 47.85,2.494 47.85,0 22.15,0 22.15,2.513 ccw(c21.574,2.513) 21.981,2.921 21.814,3.088 ccw(c21.727,3.002) 21.727,3.124 ccw(c21.544,2.941) 21.544,3.2
RoutingVias [All] p1: holewidth=0.711 width=1.27 viastyle="Through Hole" minholewidth=0.711 minwidth=1.27 maxholewidth=0.711 maxwidth=1.27 useviatemplates=TRUE viatemplateguid#1={88A6695F-8F1E-42C2-A705-81D2FC1924CC} viatemplateguid#2={6ECDD988-7257-49CB-BBFD-D7356C8FDD68} viatemplateguid#3={D78C474D-25A9-4C18-91EC-A7773D2B8F49} viatemplateguid#4={1CAF9723-81FE-4BE4-A96A-7240D60226CE} viatemplateguid#5={33274EF6-680B-47BB-B88C-FDD960DC3FC5} viatemplatename#1=v35h10m0mx0 viatemplatename#2=v45h15 viatemplatename#3=v45h15m0mx0 viatemplatename#4=v40h20 viatemplatename#5=v50h20m0mx0
SilkToSilkClearance [All] p1: silktosilkclearance=0.15
SilkToSolderMaskClearance SilkscreenOverComponentPads [IsPad] p1: minsilkscreentomaskgap=0.15 clearancetoexposedcopper=TRUE
SolderMaskExpansion [All] p1: expansion=0.102 istentingtop=FALSE
ViasUnderSMD [All] p1: allowed=FALSE
Width Width_S_50 [InNetClass('Single50')] p1: maxlimit=0.279 minlimit=0.254 preferedwidth=0.254 toplayer_minwidth=0.268 toplayer_maxwidth=0.269 toplayer_prefwidth=0.268 bottomlayer_minwidth=0.268 bottomlayer_maxwidth=0.269 bottomlayer_prefwidth=0.268 impedanceprofiledriven=TRUE impedanceprofileid={40FFE645-052D-4050-9BA8-CD5BD897BE0C} impedanceprofilevalue=50.000000 minimp=50.000000 maximp=50.000000 favimp=50.000000
Width Width_POWER [InNetClass('Power_Line')] p2: maxlimit=1 minlimit=0.25 preferedwidth=0.5
Width Width_simple [All] p3: maxlimit=1 minlimit=0.15 preferedwidth=0.25
22 further rules are at their usual default settings.

## Classes and differential pairs
net class SPI_LTC: SPI_CLK_LTC SPI_CS_LTC SPI_MISO_LTC SPI_MOSI_LTC
net class SPI_LMK: 04610_Stat0 ResetN_1V8 SPI_CLK_LMK SPI_CS_LMK SPI_MISO_LMK SPI_MOSI_LMK Sync_04610
component class Karta_ILS_TETRA: FID1 FID2 FID3 FID4 FID5 FID6 H1 H2 H3 H4 H5
net class 0F: 0F_N 0F_P
net class FPGA_CLK: CLKout3_C_N CLKout3_C_P CLKout5_C_N CLKout5_C_P
net class "Data_OUT_TO FPGA": CMLOUT_A_N CMLOUT_A_P CMLOUT_B_N CMLOUT_B_P
net class Data_OUT_TO_CAP: CMLOUT_AC_N CMLOUT_AC_P CMLOUT_BC_N CMLOUT_BC_P
differential pair class Diff_100: 0F Ain_2122_A AIn_2122_B Ain_2122A AIn_2122B CLKin0 CLKin0P CLKin1 CLKin1P CLKout1 CLKout1_C CLKout1_C2 CLKout2 CLKout2_C CLKout3 CLKout3_C CLKout4 CLKout4_C CLKout5 CLKout5_C CLKout5_C2 CLKout8 CLKout8_C CLKout9 CLKout9_C CLKout10 CLKout10_C CMLOUT_A CMLOUT_AC CMLOUT_B CMLOUT_BC LMK_CLKin0 LMK_CLKin1 LMK_OSC_IN PET1 PET2 PET3 SYNC VCXO_OUT
channel class RF_ANT: U_RF_ANT_L U_RF_ANT_M
channel class ATT: U_ATT1 U_ATT2
net class SYNC: SYNC_N SYNC_P
net class Single50: Ain_2122_A_N AIn_2122_A_P AIn_2122_B_N AIn_2122_B_P Ain_2122A_N AIn_2122A_P AIn_2122B_N AIn_2122B_P CLKin0_N CLKin0_P CLKin0P_N CLKin0P_P CLKin1P_N CLKin1P_P LMK_CLKin0_N LMK_CLKin0_P LMK_CLKin1_N LMK_CLKin1_P LMK_OSC_IN_N LMK_OSC_IN_P NetC10_U_RF_ANT_L_1 NetC10_U_RF_ANT_L_2 NetC10_U_RF_ANT_M_1 NetC10_U_RF_ANT_M_2 NetC40_1 NetC41_2 NetC43_1 NetC44_2 NetC48_2 NetC49_2 NetC62_2 NetC65_2 NetC66_2 NetC111_2 NetC159_U_RF_ANT_L_1 NetC159_U_RF_ANT_L_2 NetC159_U_RF_ANT_M_1 NetC159_U_RF_ANT_M_2 NetC160_U_RF_ANT_L_1 NetC160_U_RF_ANT_L_2 NetC160_U_RF_ANT_M_1 NetC160_U_RF_ANT_M_2 NetC162_1 NetC163_2 NetC164_1 NetC167_1 NetC168_2 NetC172_1 NetC173_1 NetC173_2 NetC175_2 NetC178_1 NetC178_2 NetC190_2 NetD1_U_RF_ANT_L_1 NetD1_U_RF_ANT_L_3 NetD1_U_RF_ANT_M_1 NetD1_U_RF_ANT_M_3 NetFL1_D NetFL3_4 NetJ5_U_RF_ANT_L_2 NetJ5_U_RF_ANT_M_2 NetJ7_2 NetJ8_2 NetJ9_2 NetJ15_2 NetL8_1 NetL9_1 NetR8_U_RF_ANT_L_2 NetR8_U_RF_ANT_M_2 NetR9_U_RF_ANT_L_2 NetR9_U_RF_ANT_M_2 NetR88_U_RF_ANT_L_2 NetR88_U_RF_ANT_M_2 NetT1_1 NetT1_3 TorRF_50Ohm_12_0 TorRF_50Ohm_12_1 TorRF_50Ohm_33_0 TorRF_50Ohm_33_1 VCXO_OUT_N VCXO_OUT_P
net class Power_Line: 3V3_DIGIT 3V3_MB 3V6_DCDC 5V 2122_0VDD 2122_VCC 4610_FINE_3V3 +12 CTRL_VCXO GND GND_VCXO NetC7_2 NetC42_2 NetC111_2 SPI_1V8_ADC SPI_1V8_CLK Vcc_5V_ATT_1 Vcc_5V_ATT_2 VDD_CORE VDD_IO VDD_OSC VDD_PLL1 VDD_PLL2CORE VDD_PLL2OSC VDDO_1/2 VDDO_3/4 VDDO_5 VDDO_6 VDDO_7/8 VDDO_9/10
net class LMK_PWR_Line: GND VDD_CORE VDD_IO VDD_OSC VDD_PLL1 VDD_PLL2CORE VDD_PLL2OSC VDDO_1/2 VDDO_3/4 VDDO_5 VDDO_6 VDDO_7/8 VDDO_9/10
net class Diff_100: Ain_2122_A_N AIn_2122_A_P AIn_2122_B_N AIn_2122_B_P Ain_2122A_N AIn_2122A_P AIn_2122B_N AIn_2122B_P CLKin0_N CLKin0_P CLKin1_N CLKin1_P CLKout1_C2_N CLKout1_C2_P CLKout1_C_N CLKout1_C_P CLKout1_N CLKout1_P CLKout3_C_N CLKout3_C_P CLKout3_N CLKout3_P CLKout5_C_N CLKout5_C_P CLKout5_N CLKout5_P CLKout8_C_N CLKout8_C_P CLKout8_N CLKout8_P CLKout10_C_N CLKout10_C_P CLKout10_N CLKout10_P LMK_CLKin0_N LMK_CLKin0_P LMK_CLKin1_N LMK_CLKin1_P NetC111_2 SYNC_N SYNC_P VCXO_OUT_N VCXO_OUT_P
net class CLK_TO_CAP: CLKout1_N CLKout1_P CLKout3_N CLKout3_P CLKout5_N CLKout5_P CLKout8_N CLKout8_P CLKout10_N CLKout10_P
net class CLK_In2: LMK_CLKin0_N LMK_CLKin0_P LMK_CLKin1_N LMK_CLKin1_P
net class CLK_In1: CLKin0_N CLKin0_P CLKin1_N CLKin1_P
net class CLK_DIST_OUT: CLKout1_N CLKout1_P CLKout3_N CLKout3_P CLKout5_N CLKout5_P CLKout8_N CLKout8_P CLKout10_N CLKout10_P
net class Ain: Ain_2122_A_N AIn_2122_A_P AIn_2122_B_N AIn_2122_B_P
net class ADC_CLK: CLKout8_N CLKout8_P CLKout10_N CLKout10_P
component class U_Tor_330MHz: C161 C162 C163 C167 C168 C169 C173 FL1 J8 J9 L9 L10 L11 R84 R85 R119 U18
component class "U_TOR ILS": C48 C49 C171 C172 C178 C188 C190 FL3 J7 J15 L6 L7 L8 R16 R116 R126 U20
component class U_RF_LANES: C156 C158 C164 C175 FB24 FB25 FB26 FB27 T1 T2 T3
component class U_RF_ANT_M: C10_U_RF_ANT_M C11_U_RF_ANT_M C12_U_RF_ANT_M C13_U_RF_ANT_M C159_U_RF_ANT_M C160_U_RF_ANT_M C186_U_RF_ANT_M C187_U_RF_ANT_M D1_U_RF_ANT_M D2_U_RF_ANT_M D7_U_RF_ANT_M J5_U_RF_ANT_M J6_U_RF_ANT_M L1_U_RF_ANT_M R8_U_RF_ANT_M R9_U_RF_ANT_M R78_U_RF_ANT_M R80_U_RF_ANT_M R83_U_RF_ANT_M R86_U_RF_ANT_M R88_U_RF_ANT_M R89_U_RF_ANT_M R90_U_RF_ANT_M R92_U_RF_ANT_M R93_U_RF_ANT_M U4_U_RF_ANT_M
component class U_RF_ANT_L: C10_U_RF_ANT_L C11_U_RF_ANT_L C12_U_RF_ANT_L C13_U_RF_ANT_L C159_U_RF_ANT_L C160_U_RF_ANT_L C186_U_RF_ANT_L C187_U_RF_ANT_L D1_U_RF_ANT_L D2_U_RF_ANT_L D7_U_RF_ANT_L J5_U_RF_ANT_L J6_U_RF_ANT_L L1_U_RF_ANT_L R8_U_RF_ANT_L R9_U_RF_ANT_L R78_U_RF_ANT_L R80_U_RF_ANT_L R83_U_RF_ANT_L R86_U_RF_ANT_L R88_U_RF_ANT_L R89_U_RF_ANT_L R90_U_RF_ANT_L R92_U_RF_ANT_L R93_U_RF_ANT_L U4_U_RF_ANT_L
component class U_POWER_CLK: C93 C94 C95 C96 C97 C98 C99 C100 C101 C102 C103 C104 C105 C106 C107 C108 C109 C110 C111 C112 C113 C114 C115 C116 C117 C118 C119 C120 C121 C122 C123 C124 C125 C126 C127 C128 C129 C130 C131 C132 C133 C134 C135 C136 C137 C138 C139 C140 C141 C142 C143 C144 C145 C146 C147 C148 C149 C150 C151 C152 FB8 FB9 FB10 FB11 FB12 FB13 FB14 FB15 FB16 FB17 FB18 FB19 FB20 FB21 R100 R101 R102 R103 R104 R105 U5 U15
component class U_POWER_ADC: C73 C74 C75 C76 C77 C78 C79 C80 C81 C82 C83 C84 C85 C86 C87 C88 C89 C90 C91 C92 C179 FB6 FB7 R96 R97 R98 R99 U6 U14
component class U_Komunikacja: C14 C15 C67 C68 C70 C71 R1 R5 R10 R11 R12 R13 R14 R15 R18 R57 R58 R59 R60 R61 R62 R64 R65 R66 R67 R68 R69 R70 R71 R72 R73 R74 R75 R87 U7 U8 U9 U10 U11 U23
component class U_Flash_memory: C154 R63 R76 R77 R79 R112 R113 R114 R115 U17
component class U_Current_volatge_meas: C153 R106 R107 R108 R109 R110 R111 U16
component class U_CLOC_DISTR: C35 C36 C37 C38 C39 C40 C41 C42 C43 C44 C45 C46 C47 C50 C51 C52 C53 C54 C55 C56 C57 C58 C59 C192 C193 J1 J2 J3 J4 R19 R20 R21 R22 R23 R24 R25 R26 R27 R28 R29 R30 R31 R32 R33 R34 R35 R36 R37 R38 R39 R40 R41 R42 X1
component class U_ATT2: C180_U_ATT2 C181_U_ATT2 C182_U_ATT2 C183_U_ATT2 C184_U_ATT2 C185_U_ATT2 R91_U_ATT2 U22_U_ATT2
component class U_ATT1: C180_U_ATT1 C181_U_ATT1 C182_U_ATT1 C183_U_ATT1 C184_U_ATT1 C185_U_ATT1 R91_U_ATT1 U22_U_ATT1
component class U_ADC_LTC2122: C60 C61 C62 C63 C64 C65 C66 R43 R44 R45 R46 R47 R48 R49 R50 R51 R52 R53 R54 R55 R56 R81 R82
component class POWER_DISTRIBUTIONS: C1 C2 C3 C4 C5 C6 C7 C8 C9 D9 D10 D11 D12 FB1 FB30 FB31 FB32 FB33 FB34 R2 R3 R4 R6 R7 R120 R121 R122 R123 R124 U1 U2 U3
component class "U_Connector miniPCIe": J10 J11 P1 R17
differential pair SYNC: +SYNC_P -SYNC_N
differential pair CLKout5: +CLKout5_P -CLKout5_N
differential pair CLKout5_C: +CLKout5_C_P -CLKout5_C_N
differential pair 0F: +0F_P -0F_N
differential pair VCXO_OUT: +VCXO_OUT_P -VCXO_OUT_N
differential pair LMK_OSC_IN: +LMK_OSC_IN_P -LMK_OSC_IN_N
differential pair CLKout1_C2: +CLKout1_C2_P -CLKout1_C2_N
differential pair CLKout8: +CLKout8_P -CLKout8_N
differential pair CLKout8_C: +CLKout8_C_P -CLKout8_C_N
differential pair CLKout3: +CLKout3_P -CLKout3_N
differential pair CLKout3_C: +CLKout3_C_P -CLKout3_C_N
differential pair CLKout10: +CLKout10_P -CLKout10_N
differential pair CLKout10_C: +CLKout10_C_P -CLKout10_C_N
differential pair LMK_CLKin1: +LMK_CLKin1_P -LMK_CLKin1_N
differential pair LMK_CLKin0: +LMK_CLKin0_P -LMK_CLKin0_N
differential pair CMLOUT_B: +CMLOUT_B_P -CMLOUT_B_N
differential pair CMLOUT_BC: +CMLOUT_BC_P -CMLOUT_BC_N
differential pair CMLOUT_A: +CMLOUT_A_P -CMLOUT_A_N
differential pair CMLOUT_AC: +CMLOUT_AC_P -CMLOUT_AC_N
differential pair CLKout1: +CLKout1_P -CLKout1_N
differential pair CLKout1_C: +CLKout1_C_P -CLKout1_C_N
differential pair CLKin1: +CLKin1_P -CLKin1_N
differential pair CLKin1P: +CLKin1P_P -CLKin1P_N
differential pair CLKin0: +CLKin0_P -CLKin0_N
differential pair CLKin0P: +CLKin0P_P -CLKin0P_N
differential pair AIn_2122B: +AIn_2122B_P -AIn_2122B_N
differential pair Ain_2122A: +AIn_2122A_P -Ain_2122A_N
differential pair AIn_2122_B: +AIn_2122_B_P -AIn_2122_B_N
differential pair Ain_2122_A: +AIn_2122_A_P -Ain_2122_A_N

## Components (designator, comment, footprint, x,y, rotation, side; value= is the part's Value field where it differs from the comment)
C1 "4.7uF" "CAP 0603/1608 RF" 3.175,15.538 r0 top
C2 "4.7uF" "CAP 0603/1608 RF" 16.403,22.166 r180 top
C3 "1uF" "CAP 0603/1608 RF" 4.408,53.721 r180 top
C4 "2.2uF" "CAP 0402/1005 RF KK" 9,58.108 r270 top
C5 "100pF" "CAP 0402/1005 RF KK" 10.096,55.675 r180 top
C6 "1uF" "CAP 0402/1005 RF KK" 11.815,25.299 r0 top
C7 "1uF" "CAP 0402/1005 RF KK" 9.626,29.282 r180 top
C8 "4.7uF" "CAP 0402/1005 RF KK" 8.151,29.62 r270 top
C9 "4.7uF" "CAP 0402/1005 RF KK" 7.134,29.62 r270 top
C10_U_RF_ANT_L "120pF" "CAP 0402/1005 RF KK" 23.55,74.914 r0 bottom (schematic designator C10)
C10_U_RF_ANT_M "120pF" "CAP 0402/1005 RF KK" 46.663,74.669 r180 bottom (schematic designator C10)
C11_U_RF_ANT_L "100nF" "CAP 0201/0603 KK"#1 23.991,72.5 r180 bottom (schematic designator C11)
C11_U_RF_ANT_M "100nF" "CAP 0201/0603 KK"#2 45.319,76.962 r0 bottom (schematic designator C11)
C12_U_RF_ANT_L "100pF" "CAP 0201/0603 KK"#2 20.204,71.982 r0 bottom (schematic designator C12)
C12_U_RF_ANT_M "100pF" "CAP 0201/0603 KK"#2 50.689,77.544 r0 bottom (schematic designator C12)
C13_U_RF_ANT_L "100nF" "CAP 0201/0603 KK"#2 20.204,71.205 r180 bottom (schematic designator C13)
C13_U_RF_ANT_M "100nF" "CAP 0201/0603 KK"#2 49.428,77.544 r0 bottom (schematic designator C13)
C14 "100nF" "CAP 0201/0603 KK"#2 34.625,9.319 r270 top
C15 "100nF" "CAP 0201/0603 KK"#2 33.067,11.319 r180 top
C35 "10uF" "CAP 0402/1005 RF KK" 52.861,14.519 r90 bottom
C36 "10uF" "CAP 0402/1005 RF KK" 58.326,26.547 r270 bottom
C37 "10uF" "CAP 0402/1005 RF KK" 55.918,25.232 r270 bottom
C38 "4.7uF" "CAP 0603/1608 RF" 59.894,50.14 r0 top
C39 "100nF" "CAP 0201/0603 KK"#2 53.333,35.536 r180 top
C40 "100nF" "CAP 0201/0603 KK"#2 53.61,40.955 r90 top
C41 "100nF" "CAP 0201/0603 KK"#2 53.632,36.613 r90 top
C42 "100pF" "CAP 0402/1005 RF KK" 54.574,50.14 r0 top
C43 "100nF" "CAP 0201/0603 KK"#2 54.323,40.955 r90 top
C44 "100nF" "CAP 0201/0603 KK"#2 54.271,36.613 r90 top
C45 "100nF" "CAP 0201/0603 KK"#2 54.573,35.536 r180 top
C46 "100nF" "CAP 0201/0603 KK"#2 58.847,14.205 r270 bottom
C47 "100nF" "CAP 0201/0603 KK"#2 59.538,14.205 r270 bottom
C48 "100nF" "CAP 0402/1005 RF KK" 14.769,65.731 r0 bottom
C49 "68nF" "CAP 0402/1005 RF KK" 27.45,61.885 r270 bottom
C50 "100nF" "CAP 0201/0603 KK"#2 63.364,19.559 r180 bottom
C51 "100nF" "CAP 0201/0603 KK"#2 63.364,18.839 r180 bottom
C52 "100nF" "CAP 0201/0603 KK"#2 44.806,28.326 r0 bottom
C53 "100nF" "CAP 0201/0603 KK"#2 44.806,29.046 r0 bottom
C54 "100nF" "CAP 0201/0603 KK"#2 61.063,14.259 r270 bottom
C55 "100nF" "CAP 0201/0603 KK"#2 44.806,30.567 r0 bottom
C56 "100nF" "CAP 0201/0603 KK"#2 44.806,29.847 r0 bottom
C57 "100nF" "CAP 0201/0603 KK"#2 62.747,32.964 r180 top
C58 "100nF" "CAP 0201/0603 KK"#2 62.744,32.272 r180 top
C59 "100nF" "CAP 0201/0603 KK"#2 60.323,14.259 r270 bottom
C60 "1nF" "CAP 0201/0603 KK"#2 38.073,7.831 r270 bottom
C61 "1nF" "CAP 0201/0603 KK"#2 38.734,7.831 r270 bottom
C62 "100nF" "CAP 0201/0603 KK"#2 38.053,38.2 r0 bottom
C63 "1nF" "CAP 0201/0603 KK"#2 35.68,7.831 r270 bottom
C64 "1nF" "CAP 0201/0603 KK"#2 36.34,7.831 r270 bottom
C65 "2.2uF" "CAP 0402/1005 RF KK" 38.743,35.004 r0 bottom
C66 "100nF" "CAP 0201/0603 KK"#2 39.497,38.196 r180 bottom
C67 "1uF" "CAP 0402/1005 RF KK" 23.285,28.876 r0 top
C68 "1uF" "CAP 0402/1005 RF KK" 8.203,48.107 r90 top
C70 "100nF" "CAP 0201/0603 KK"#2 40.287,9.39 r270 top
C71 "100nF" "CAP 0201/0603 KK"#2 40.84,12.524 r90 top
C73 "2.2uF" "CAP 0402/1005 RF KK" 36.863,34.288 r0 top
C74 "2.2uF" "CAP 0402/1005 RF KK" 39.449,34.395 r270 top
C75 "4.7uF" "CAP 0603/1608 RF" 27.203,17.196 r90 top
C76 "4.7uF" "CAP 0603/1608 RF" 42.997,33.486 r180 top
C77 "100nF" "CAP 0201/0603 KK"#2 41.367,33.588 r270 top
C78 "100nF" "CAP 0201/0603 KK"#2 43.341,31.448 r180 top
C79 "100nF" "CAP 0201/0603 KK"#2 33.759,32.303 r0 top
C80 "100nF" "CAP 0201/0603 KK"#2 43.572,25.723 r180 top
C81 "100nF" "CAP 0201/0603 KK"#2 33.869,25.723 r0 top
C82 "100nF" "CAP 0201/0603 KK"#2 35.284,33.642 r270 top
C83 "100nF" "CAP 0201/0603 KK"#2 33.869,26.442 r0 top
C84 "100nF" "CAP 0201/0603 KK"#2 33.754,31.442 r0 top
C85 "100nF" "CAP 0201/0603 KK"#2 43.572,26.442 r180 top
C86 "10uF" "CAP 0603/1608 RF" 33.274,24.663 r0 top
C87 "10uF" "CAP 0603/1608 RF" 33.705,34.053 r270 top
C88 "100nF" "CAP 0201/0603 KK"#2 41.492,23.877 r90 top
C89 "100nF" "CAP 0201/0603 KK"#2 40.779,23.877 r90 top
C90 "100nF" "CAP 0201/0603 KK"#2 35.677,23.877 r90 top
C91 "4.7uF" "CAP 0603/1608 RF" 18.427,15.979 r90 top
C92 "1nF" "CAP 0201/0603 KK"#2 22.323,13.023 r180 top
C93 "100nF" "CAP 0201/0603 KK"#2 61.039,26.796 r90 top
C94 "100nF" "CAP 0201/0603 KK"#2 58.484,26.689 r90 top
C95 "100nF" "CAP 0201/0603 KK"#2 59.826,24.355 r180 top
C96 "10uF" "CAP 0402/1005 RF KK" 58.473,25.015 r270 top
C97 "100nF" "CAP 0201/0603 KK"#2 54.755,10.461 r180 top
C98 "100nF" "CAP 0201/0603 KK"#2 53.873,11.741 r270 top
C99 "100nF" "CAP 0201/0603 KK"#2 53.864,13.002 r90 top
C100 "10uF" "CAP 0402/1005 RF KK" 55.015,14.19 r180 top
C101 "100nF" "CAP 0201/0603 KK"#2 57.471,26.717 r90 top
C102 "100nF" "CAP 0201/0603 KK"#2 55.091,26.696 r90 top
C103 "100nF" "CAP 0201/0603 KK"#2 56.124,24.342 r0 top
C104 "10uF" "CAP 0402/1005 RF KK" 57.471,25.015 r270 top
C105 "100nF" "CAP 0201/0603 KK"#2 51.913,26.561 r90 top
C106 "100nF" "CAP 0201/0603 KK"#2 54.314,26.688 r90 top
C107 "100nF" "CAP 0201/0603 KK"#2 53.276,24.372 r0 top
C108 "10uF" "CAP 0402/1005 RF KK" 54.754,25.078 r270 top
C109 "100nF" "CAP 0201/0603 KK"#2 59.538,38.01 r180 top
C110 "100nF" "CAP 0201/0603 KK"#2 59.538,38.836 r180 top
C111 "100nF" "CAP 0201/0603 KK"#2 58.063,41.239 r180 top
C112 "10uF" "CAP 0402/1005 RF KK" 58.063,42.044 r180 top
C113 "100nF" "CAP 0201/0603 KK"#2 60.93,11.748 r270 top
C114 "100nF" "CAP 0201/0603 KK"#2 59.777,10.557 r0 top
C115 "100nF" "CAP 0201/0603 KK"#2 59.517,13.95 r0 top
C116 "10uF" "CAP 0402/1005 RF KK" 60.962,13.39 r90 top
C117 "100nF" "CAP 0201/0603 KK"#2 49.647,14.414 r180 top
C118 "100nF" "CAP 0201/0603 KK"#2 49.099,15.576 r270 top
C119 "100nF" "CAP 0201/0603 KK"#2 52.634,15.576 r90 top
C120 "10uF" "CAP 0402/1005 RF KK" 51.334,14.344 r0 top
C121 "100nF" "CAP 0201/0603 KK"#2 65.538,21.31 r0 top
C122 "100nF" "CAP 0201/0603 KK"#2 66.24,20.009 r90 top
C123 "100nF" "CAP 0201/0603 KK"#2 62.884,19.7 r90 top
C124 "10uF" "CAP 0402/1005 RF KK" 63.931,21.317 r180 top
C125 "100nF" "CAP 0201/0603 KK"#2 49.053,17.51 r90 top
C126 "100nF" "CAP 0201/0603 KK"#2 49.739,18.718 r180 top
C127 "100nF" "CAP 0201/0603 KK"#2 52.719,17.519 r90 top
C128 "10uF" "CAP 0402/1005 RF KK" 51.383,18.718 r0 top
C129 "10uF" "CAP 0603/1608 RF" 26.892,38.275 r270 top
C130 "10nF" "CAP 0201/0603 KK"#2 25.42,36.925 r0 top
C131 "100nF" "CAP 0201/0603 KK"#2 65.749,16.751 r0 top
C132 "100nF" "CAP 0201/0603 KK"#2 66.373,17.977 r270 top
C133 "100nF" "CAP 0201/0603 KK"#2 62.884,17.954 r90 top
C134 "10uF" "CAP 0402/1005 RF KK" 64.219,16.751 r180 top
C135 "100nF" "CAP 0201/0603 KK"#2 49.112,20.009 r90 top
C136 "100nF" "CAP 0201/0603 KK"#2 49.914,21.323 r180 top
C137 "100nF" "CAP 0201/0603 KK"#2 52.576,20.009 r90 top
C138 "10uF" "CAP 0402/1005 RF KK" 51.388,21.323 r0 top
C139 "10uF" "CAP 0805/2012 RF" 18.711,33.282 r0 top
C140 "10uF" "CAP 0805/2012 RF" 18.711,35.427 r0 top
C141 "10uF" "CAP 0603/1608 RF" 26.788,30.44 r90 top
C142 "10nF" "CAP 0201/0603 KK"#2 25.346,31.596 r0 top
C143 "100nF" "CAP 0201/0603 KK"#2 66.457,15.113 r270 top
C144 "100nF" "CAP 0201/0603 KK"#2 65.788,13.932 r0 top
C145 "100nF" "CAP 0201/0603 KK"#2 62.911,15.324 r270 top
C146 "10uF" "CAP 0402/1005 RF KK" 64.212,13.763 r180 top
C147 "100nF" "CAP 0201/0603 KK"#2 57.909,11.485 r270 top
C148 "100nF" "CAP 0201/0603 KK"#2 56.684,10.769 r0 top
C149 "100nF" "CAP 0201/0603 KK"#2 56.794,14.273 r0 top
C150 "10uF" "CAP 0402/1005 RF KK" 57.909,13.006 r90 top
C151 "100nF" "CAP 0402/1005 RF KK" 22.816,30.764 r180 top
C152 "100nF" "CAP 0402/1005 RF KK" 22.453,37.475 r0 top
C153 "100nF" "CAP 0201/0603 KK"#2 17.323,9.367 r270 top
C154 "100nF" "CAP 0201/0603 KK"#2 15.748,33.609 r0 bottom
C156 "120pF" "CAP 0402/1005 RF KK" 37.392,54.374 r0 bottom
C158 "120pF" "CAP 0402/1005 RF KK" 40.704,47.788 r180 bottom
C159_U_RF_ANT_L "120pF" "CAP 0402/1005 RF KK" 12.408,73.339 r90 bottom (schematic designator C159)
C159_U_RF_ANT_M "120pF" "CAP 0402/1005 RF KK" 58.1,73.6 r90 bottom (schematic designator C159)
C160_U_RF_ANT_L "120pF" "CAP 0402/1005 RF KK" 21.882,78.505 r0 bottom (schematic designator C160)
C160_U_RF_ANT_M "120pF" "CAP 0402/1005 RF KK" 48.599,78.505 r180 bottom (schematic designator C160)
C161 "8.2nF" "CAP 0603/1608 RF" 48.038,56.281 r270 bottom
C162 "8.2nF" "CAP 0603/1608 RF" 43.658,57.531 r90 bottom
C163 "100pF" "CAP 0201/0603 KK"#2 57.34,64.53 r0 bottom
C164 "120pF" "CAP 0402/1005 RF KK" 42.748,48.365 r270 bottom
C167 "82pF" "CAP 0402/1005 RF KK" 57.6,66.512 r270 bottom
C168 "10pF" "CAP 0402/1005 RF KK" 43.426,60.067 r270 bottom
C169 "100pF" "CAP 0201/0603 KK"#2 44.659,59.282 r90 bottom
C171 "8.2nF" "CAP 0603/1608 RF" 27.491,55.799 r270 bottom
C172 "8.2nF" "CAP 0603/1608 RF" 29.725,57.704 r180 bottom
C173 "120pF" "CAP 0402/1005 RF KK" 51.444,67.662 r0 bottom
C175 "120pF" "CAP 0402/1005 RF KK" 34.358,54.95 r90 bottom
C178 "120pF" "CAP 0402/1005 RF KK" 20.054,67.371 r180 bottom
C179 "100nF" "CAP 0201/0603 KK"#2 36.492,23.877 r90 top
C180_U_ATT1 "100nF" "CAP 0201/0603 KK"#1 27.01,71.271 r0 bottom (schematic designator C180)
C180_U_ATT2 "100nF" "CAP 0201/0603 KK"#2 43.618,65.397 r0 bottom (schematic designator C180)
C181_U_ATT1 "10uF" "CAP 0402/1005 RF KK" 26.895,70.416 r0 bottom (schematic designator C181)
C181_U_ATT2 "10uF" "CAP 0402/1005 RF KK" 43.624,64.53 r0 bottom (schematic designator C181)
C182_U_ATT1 "330pF" "CAP 0402/1005 RF KK" 20.719,65.206 r270 bottom (schematic designator C182)
C182_U_ATT2 "330pF" "CAP 0402/1005 RF KK" 51.453,69.089 r0 bottom (schematic designator C182)
C183_U_ATT1 "330pF" "CAP 0402/1005 RF KK" 23.307,63.862 r270 bottom (schematic designator C183)
C183_U_ATT2 "330pF" "CAP 0402/1005 RF KK" 48.338,71.338 r90 bottom (schematic designator C183)
C184_U_ATT1 "330pF" "CAP 0402/1005 RF KK" 24.35,63.862 r270 bottom (schematic designator C184)
C184_U_ATT2 "330pF" "CAP 0402/1005 RF KK" 47.338,71.338 r90 bottom (schematic designator C184)
C185_U_ATT1 "330pF" "CAP 0402/1005 RF KK" 25.4,63.862 r270 bottom (schematic designator C185)
C185_U_ATT2 "330pF" "CAP 0402/1005 RF KK" 46.338,71.338 r90 bottom (schematic designator C185)
C186_U_RF_ANT_L "100pF" "CAP 0201/0603 KK"#2 12.668,75 r180 bottom (schematic designator C186)
C186_U_RF_ANT_M "100pF" "CAP 0201/0603 KK"#2 57.84,75.16 r0 bottom (schematic designator C186)
C187_U_RF_ANT_L "100pF" "CAP 0201/0603 KK"#2 23.657,78.78 r270 bottom (schematic designator C187)
C187_U_RF_ANT_M "100pF" "CAP 0201/0603 KK"#2 47,78.765 r270 bottom (schematic designator C187)
C188 "100pF" "CAP 0201/0603 KK"#2 28.643,61.62 r270 bottom
C190 "100pF" "CAP 0201/0603 KK"#2 16.651,61.62 r270 bottom
C192 "100nF" "CAP 0201/0603 KK"#2 63.398,17.065 r180 bottom
C193 "100nF" "CAP 0201/0603 KK"#2 63.398,16.341 r180 bottom
D1_U_RF_ANT_L "CLA4611-085LF" CLA4611-085LF 14.75,78.505 r0 bottom (schematic designator D1)
D1_U_RF_ANT_M "CLA4611-085LF" CLA4611-085LF 55.386,78.505 r180 bottom (schematic designator D1)
D2_U_RF_ANT_L "CLA4603-085LF" CLA4611-085LF 17.481,78.505 r0 bottom (schematic designator D2)
D2_U_RF_ANT_M "CLA4603-085LF" CLA4611-085LF 52.463,78.505 r180 bottom (schematic designator D2)
D7_U_RF_ANT_L "MADP-011029-14150T" ODS-1415 12.009,76.674 r90 bottom (schematic designator D7)
D7_U_RF_ANT_M "MADP-011029-14150T" ODS-1415 57.7,76.85 r90 bottom (schematic designator D7)
D9 "LTST-C190GKT" "LED 0603/1608 GREEN" 16.674,14.594 r90 top
D10 "LTST-C190GKT" "LED 0603/1608 GREEN" 1.664,58.828 r90 top
D11 "LTST-C190GKT" "LED 0603/1608 GREEN" 2.715,9.075 r270 top
D12 "LTST-C190GKT" "LED 0603/1608 GREEN" 8.776,24.439 r270 top
FB1 "120R" "FER 0603/1608 KK" 8.311,27.846 r180 top
FB6 "120R" "FER 0402/1005 KK" 29.701,24.084 r90 top
FB7 "33R" FB1206 32.5,22.585 r0 top
FB8 "220R" "FER 0603/1608 KK" 59.788,26.223 r270 top
FB9 "220R" "FER 0603/1608 KK" 55.049,12.219 r90 top
FB10 "220R" "FER 0603/1608 KK" 56.234,26.238 r270 top
FB11 "220R" "FER 0603/1608 KK" 53.151,26.244 r270 top
FB12 "220R" "FER 0603/1608 KK" 58.054,39.511 r90 top
FB13 "220R" "FER 0603/1608 KK" 59.671,12.24 r90 top
FB14 "220R" "FER 0603/1608 KK" 50.872,15.657 r0 top
FB15 "120R" "FER 0603/1608 KK" 61.233,41.699 r0 top
FB16 "220R" "FER 0603/1608 KK" 64.481,19.928 r180 top
FB17 "220R" "FER 0603/1608 KK" 50.872,17.514 r0 top
FB18 "220R" "FER 0603/1608 KK" 64.599,18.014 r180 top
FB19 "220R" "FER 0603/1608 KK" 50.825,20.009 r0 top
FB20 "220R" "FER 0603/1608 KK" 64.704,15.088 r180 top
FB21 "220R" "FER 0603/1608 KK" 56.684,12.492 r90 top
FB24 "120R" "FER 0402/1005 KK" 27.01,72.178 r0 bottom
FB25 "120R" "FER 0402/1005 KK" 44.448,63.272 r180 bottom
FB26 "120R" "FER 0402/1005 KK" 27.019,57.691 r0 bottom
FB27 "120R" "FER 0402/1005 KK" 49.454,56.466 r90 bottom
FB30 "120R" "FER 0603/1608 KK" 19,10.536 r0 top
FB31 "120R" "FER 0603/1608 KK" 19,12.167 r0 top
FB32 "120R" "FER 0603/1608 KK" 32.114,43.427 r90 top
FB33 "120R" "FER 0603/1608 KK" 30.476,43.42 r90 top
FB34 "120R" "FER 0603/1608 KK" 28.836,43.42 r90 top
FID1 "Fiducials" Fiducials 1.789,80.79 r0 top
FID2 "Fiducials" Fiducials 66.7,80.9 r0 top
FID3 "Fiducials" Fiducials 49.784,42.52 r0 top
FID4 "Fiducials" Fiducials 30.351,48.743 r0 top
FID5 "Fiducials" Fiducials 3.735,36.091 r0 top
FID6 "Fiducials" Fiducials 51.2,24.683 r0 top
FL1 "SAW TB0787A" TB0787A 51.975,60.812 r180 bottom
FL3 "SAW B3802" QCC12B 20.773,60.09 r0 bottom
H1 "6.5x0.8x1.27mm" 36900000 21.473,52.472 r180 bottom
H2 "6.5x0.8x1.27mm" 36900000 10.3,65.281 r90 bottom
H3 "6.5x0.8x1.27mm" 36900000 35.365,81.585 r180 bottom
H4 "6.5x0.8x1.27mm" 36900000 59.722,60.08 r90 bottom
H5 "6.5x0.8x1.27mm" 36900000 50,52.472 r180 bottom
J1 "1909763-1" TECO-1909763-1_V 67.34,50.708 r180 top
J2 "1909763-1" TECO-1909763-1_V 67.34,55.96 r0 top
J3 "1909763-1" TECO-1909763-1_V 67.34,35.27 r0 top
J4 "1909763-1" TECO-1909763-1_V 67.34,29.953 r180 top
J5_U_RF_ANT_L "1909763-1" TECO-1909763-1_V 26.855,73.708 r270 top (schematic designator J5)
J5_U_RF_ANT_M "1909763-1" TECO-1909763-1_V 43.913,75.784 r90 top (schematic designator J5)
J6_U_RF_ANT_L "32K101-400L5" ROS-32K101-400L5_V 5.284,65.831 r180 top (schematic designator J6)
J6_U_RF_ANT_M "32K101-400L5" ROS-32K101-400L5_V 65.2,65.831 r180 top (schematic designator J6)
J7 "1909763-1" TECO-1909763-1_V 16.294,71.338 r0 top
J8 "1909763-1" TECO-1909763-1_V 54.559,63.868 r180 top
J9 "1909763-1" TECO-1909763-1_V 41.352,55.025 r90 top
J10 "1909763-1" TECO-1909763-1_V 27.415,37.8 r270 bottom
J11 "1909763-1" TECO-1909763-1_V 32.088,37.8 r90 bottom
J15 "1909763-1" TECO-1909763-1_V 38.205,57.066 r270 top
L1_U_RF_ANT_L "43nH" "IND 0402/1005 RF WW" 19.774,78.065 r90 bottom (schematic designator L1)
L1_U_RF_ANT_M "43nH" "IND 0402/1005 RF WW" 50.324,78.945 r270 bottom (schematic designator L1)
L6 "56nH" FB0402 15.294,63.981 r270 bottom
L7 "56nH" FB0402 25.613,61.36 r0 bottom
L8 "270nH, 0.17A" WE-KI_0603 32.615,59.123 r270 bottom
L9 "270nH, 0.17A" WE-KI_0603 41.067,56.906 r0 bottom
L10 "18nH" FB0603 46.382,59.542 r180 bottom
L11 "12nH" FB0603 55.8,66.965 r90 bottom
P1 "PCIeMini-CN-2S-M-R52" PCIeMini-GF-2D-800-1K-S52 35,1.4 r0 top locked
R1 "10kR" "RES 0402/1005 RF KK" 27.966,13.428 r90 bottom
R2 "11.3kR" "RES 0402/1005 RF KK" 13.029,23.701 r90 top
R3 "0mR" "RES 0402/1005 RF KK" 5.828,23.229 r0 top
R4 "3.16kR" "RES 0402/1005 RF KK" 11.278,23.229 r0 top
R5 "0mR" "RES 0402/1005 RF KK" 39.533,19.05 r0 top
R6 "82.5kR" "RES 0402/1005 RF KK" 8.786,26.507 r180 top
R7 "14.7kR" "RES 0402/1005 RF KK" 10.102,24.889 r90 top
R8_U_RF_ANT_L "4.99R" "RES 0402/1005 RF KK" 25.4,78.505 r0 bottom (schematic designator R8)
R8_U_RF_ANT_M "4.99R" "RES 0402/1005 RF KK" 45.304,78.505 r180 bottom (schematic designator R8)
R9_U_RF_ANT_L "4.99R" "RES 0402/1005 RF KK" 28.448,74.719 r270 bottom (schematic designator R9)
R9_U_RF_ANT_M "4.99R" "RES 0402/1005 RF KK" 42.754,74.719 r270 bottom (schematic designator R9)
R10 "1kR" "RES 0402/1005 RF KK" 16.711,19.539 r270 bottom
R11 "1kR" "RES 0402/1005 RF KK" 18.257,19.539 r270 bottom
R12 "10kR" "RES 0402/1005 RF KK" 43.658,13.929 r90 bottom
R13 "1kR" "RES 0402/1005 RF KK" 28.55,15.836 r180 bottom
R14 "2kR" "RES 0402/1005 RF KK" 30.399,28.832 r180 top
R15 "10kR" "RES 0402/1005 RF KK" 30.331,30.789 r180 top
R16 "0mR" "RES 0402/1005 RF - 3-PADS" 17.444,67.368 r180 bottom
R17 "100R" "RES 0201/0603"#1 29.75,34.802 r0 bottom
R18 "0mR" "RES 0402/1005 RF KK" 44.096,14.19 r90 top
R19 "51R" "RES 0402/1005 RF KK" 52.972,37.783 r180 top
R20 "0mR" "RES 0402/1005 RF KK" 57.119,50.14 r180 top
R21 "0mR" "RES 0402/1005 RF KK" 53.493,39.225 r270 top
R22 "0mR" "RES 0402/1005 RF KK" 54.443,39.225 r270 top
R23 "51R" "RES 0402/1005 RF KK" 54.963,37.783 r180 top
R24 "0mR" "RES 0402/1005 RF KK" 62.009,52.882 r180 top
R25 "270R" "RES 0402/1005 RF KK" 63.451,52.405 r90 top
R26 "51R" "RES 0402/1005 RF KK" 60.569,52.405 r90 top
R27 "100R" "RES 0402/1005 RF KK" 59.49,53.339 r270 top
R28 "270R" "RES 0402/1005 RF KK" 63.454,54.29 r90 top
R29 "51R" "RES 0402/1005 RF KK" 60.556,54.29 r90 top
R30 "0mR" "RES 0402/1005 RF KK" 62.009,53.819 r180 top
R31 "0mR" "RES 0402/1005 RF KK" 61.176,10.766 r90 bottom
R32 "270R" "RES 0402/1005 RF KK" 61.63,9.347 r180 bottom
R33 "51R" "RES 0402/1005 RF KK" 61.63,12.189 r180 bottom
R34 "100R" "RES 0402/1005 RF KK" 60.693,13.066 r0 bottom
R35 "0mR" "RES 0402/1005 RF KK" 63.924,22.124 r0 bottom
R36 "0mR" "RES 0402/1005 RF KK" 63.924,21.274 r0 bottom
R37 "270R" "RES 0402/1005 RF KK" 59.76,9.347 r180 bottom
R38 "51R" "RES 0402/1005 RF KK" 59.76,12.189 r180 bottom
R39 "0mR" "RES 0402/1005 RF KK" 60.21,10.766 r90 bottom
R40 "51R" "RES 0402/1005 RF KK" 60.037,33.518 r270 top
R41 "100R" "RES 0402/1005 RF KK" 61.455,32.618 r270 top
R42 "51R" "RES 0402/1005 RF KK" 60.037,31.662 r270 top
R43 "100R" "RES 0201/0603"#1 43.733,28.692 r90 bottom
R44 "100R" "RES 0201/0603"#2 43.729,30.212 r270 bottom
R45 "4.7R" "RES 0402/1005 RF KK" 35.43,37.077 r270 bottom
R46 "45.3R" "RES 0402/1005 RF KK" 34.8,39.135 r0 bottom
R47 "100R" "RES 0402/1005 RF KK" 35.887,35.604 r180 bottom
R48 "45.3R" "RES 0402/1005 RF KK" 36.842,39.135 r0 bottom
R49 "4.7R" "RES 0402/1005 RF KK" 36.342,37.077 r270 bottom
R50 "24.9R" "RES 0402/1005 RF KK" 38.133,36.572 r90 bottom
R51 "4.99R" "RES 0402/1005 RF KK" 41.947,37.216 r270 bottom
R52 "45.3R" "RES 0402/1005 RF KK" 42.48,40.275 r180 bottom
R53 "100R" "RES 0402/1005 RF KK" 41.497,35.771 r0 bottom
R54 "24.9R" "RES 0402/1005 RF KK" 39.329,36.572 r270 bottom
R55 "45.3R" "RES 0402/1005 RF KK" 40.506,40.275 r180 bottom
R56 "4.99R" "RES 0402/1005 RF KK" 41.047,37.216 r270 bottom
R57 "1kR" "RES 0402/1005 RF KK" 17.445,44.02 r90 top
R58 "1kR" "RES 0402/1005 RF KK" 18.334,44.02 r90 top
R59 "1kR" "RES 0402/1005 RF KK" 19.223,44.02 r90 top
R60 "0mR" "RES 0402/1005 RF KK" 17.445,46.975 r270 top
R61 "0mR" "RES 0402/1005 RF KK" 18.334,46.975 r270 top
R62 "0mR" "RES 0402/1005 RF KK" 19.223,46.982 r270 top
R63 "10kR" "RES 0402/1005 RF KK" 5.69,38.743 r0 bottom
R64 "10kR" "RES 0402/1005 RF KK" 47.032,7.858 r0 bottom
R65 "1kR" "RES 0402/1005 RF KK" 24.3,11.519 r270 bottom
R66 "1kR" "RES 0402/1005 RF KK" 25.429,11.519 r270 bottom
R67 "1kR" "RES 0402/1005 RF KK" 18.351,27.442 r270 top
R68 "1kR" "RES 0402/1005 RF KK" 17.162,27.442 r270 top
R69 "1kR" "RES 0402/1005 RF KK" 16.032,27.442 r270 top
R70 "0mR" "RES 0402/1005 RF KK" 31.982,9.991 r90 top
R71 "0mR" "RES 0402/1005 RF KK" 31.025,10.004 r90 top
R72 "0mR" "RES 0402/1005 RF KK" 18.351,24.623 r90 top
R73 "0mR" "RES 0402/1005 RF KK" 17.187,24.623 r90 top
R74 "0mR" "RES 0402/1005 RF KK" 16.032,24.623 r90 top
R75 "0mR" "RES 0402/1005 RF KK" 32.61,17.189 r270 top
R76 "10kR" "RES 0402/1005 RF KK" 5.69,39.886 r0 bottom
R77 "0mR" "RES 0402/1005 RF KK" 3.454,38.743 r0 bottom
R78_U_RF_ANT_L "220R" "RES 0402/1005 RF KK" 28.095,77.031 r225 bottom (schematic designator R78)
R78_U_RF_ANT_M "220R" "RES 0402/1005 RF KK" 43.108,77.031 r315 bottom (schematic designator R78)
R79 "0mR" "RES 0402/1005 RF KK" 3.454,39.886 r0 bottom
R80_U_RF_ANT_L "61.9R" "RES 0402/1005 RF KK" 25.546,75.414 r270 bottom (schematic designator R80)
R80_U_RF_ANT_M "61.9R" "RES 0402/1005 RF KK" 45.082,74.169 r90 bottom (schematic designator R80)
R81 "" "RES 0402/1005 RF KK" 38.411,6.52 r180 bottom
R82 "" "RES 0402/1005 RF KK" 36.004,6.52 r180 bottom
R83_U_RF_ANT_L "49.9R" "RES 0402/1005 RF KK" 21.619,75.414 r90 bottom (schematic designator R83)
R83_U_RF_ANT_M "49.9R" "RES 0402/1005 RF KK" 48.35,74.169 r270 bottom (schematic designator R83)
R84 "15R" "RES 0603/1608 RF" 45.898,56.906 r0 bottom
R85 "0mR" "RES 0402/1005 RF - 3-PADS" 53.753,67.67 r0 bottom
R86_U_RF_ANT_L "40.2kR" "RES 0402/1005 RF KK" 15.794,74.5 r180 bottom (schematic designator R86)
R86_U_RF_ANT_M "40.2kR" "RES 0402/1005 RF KK" 50.708,71.588 r270 bottom (schematic designator R86)
R87 "1kR" "RES 0402/1005 RF KK" 28.55,16.852 r180 bottom
R88_U_RF_ANT_L "0mR" "RES 0402/1005 RF KK" 22.625,73.764 r180 bottom (schematic designator R88)
R88_U_RF_ANT_M "0mR" "RES 0402/1005 RF KK" 47.582,75.784 r0 bottom (schematic designator R88)
R89_U_RF_ANT_L "1kR" "RES 0402/1005 RF KK" 15.794,75.7 r180 bottom (schematic designator R89)
R89_U_RF_ANT_M "1kR" "RES 0402/1005 RF KK" 49.578,71.588 r270 bottom (schematic designator R89)
R90_U_RF_ANT_L "4.02kR" "RES 0402/1005 RF KK" 22.294,72.5 r180 bottom (schematic designator R90)
R90_U_RF_ANT_M "4.02kR" "RES 0402/1005 RF KK" 47.1,76.919 r0 bottom (schematic designator R90)
R91_U_ATT1 "1kR" "RES 0402/1005 RF KK" 20.136,69.661 r270 bottom (schematic designator R91)
R91_U_ATT2 "1kR" "RES 0402/1005 RF KK" 53.478,74.169 r270 bottom (schematic designator R91)
R92_U_RF_ANT_L "" "RES 0402/1005 RF - 3-PADS" 15.35,71.511 r90 bottom (schematic designator R92)
R92_U_RF_ANT_M "" "RES 0402/1005 RF - 3-PADS" 54.848,72.088 r90 bottom (schematic designator R92)
R93_U_RF_ANT_L "" "RES 0402/1005 RF - 3-PADS" 13.229,67.593 r270 bottom (schematic designator R93)
R93_U_RF_ANT_M "" "RES 0402/1005 RF - 3-PADS" 52.463,71.588 r270 bottom (schematic designator R93)
R96 "1kR" "RES 0402/1005 RF KK" 36.867,33.186 r0 top
R97 "100kR" "RES 0402/1005 RF KK" 19.993,19.791 r270 top
R98 "100kR" "RES 0402/1005 RF KK" 25.942,17.276 r90 top
R99 "38.3kR" "RES 0402/1005 RF KK" 26.475,15.242 r180 top
R100 "3.57kR" "RES 0402/1005 RF KK" 25.246,37.855 r0 top
R101 "1.15kR" "RES 0402/1005 RF KK" 25.295,38.978 r180 top
R102 "1.87kR" "RES 0402/1005 RF KK" 25.146,30.74 r0 top
R103 "1.5kR" "RES 0402/1005 RF KK" 25.146,29.791 r0 top
R104 "20kR" "RES 0402/1005 RF KK" 22.46,38.442 r180 top
R105 "20kR" "RES 0402/1005 RF KK" 21.023,30.764 r90 top
R106 "FCSL110R005FER" FCSL110R005FERCT-ND 10.789,7.09 r90 top
R107 "10kR" "RES 0402/1005 RF KK" 25.879,7.285 r0 top
R108 "0mR" "RES 0402/1005 RF KK" 22.303,7.285 r0 bottom
R109 "0mR" "RES 0402/1005 RF KK" 22.294,6.294 r0 bottom
R110 "1kR" "RES 0402/1005 RF KK" 19.825,7.285 r0 bottom
R111 "1kR" "RES 0402/1005 RF KK" 19.83,6.294 r0 bottom
R112 "10kR" "RES 0402/1005 RF KK" 16.161,35.33 r270 bottom
R113 "10kR" "RES 0402/1005 RF KK" 5.69,41.029 r0 bottom
R114 "0mR" "RES 0402/1005 RF KK" 3.454,41.029 r0 bottom
R115 "0mR" "RES 0402/1005 RF KK" 16.611,36.872 r180 bottom
R116 "0mR" "RES 0402/1005 RF - 3-PADS" 34.358,57.094 r90 bottom
R119 "0mR" "RES 0402/1005 RF - 3-PADS" 40.43,55.025 r90 bottom
R120 "560R" "RES 0402/1005 RF KK" 15.074,14.768 r90 top
R121 "1kR" "RES 0402/1005 RF KK" 3.161,11.386 r0 top
R122 "1kR" "RES 0402/1005 RF KK" 4.179,59.3 r0 top
R123 "1kR" "RES 0402/1005 RF KK" 13.329,27.952 r270 top
R124 "560R" "RES 0402/1005 RF KK" 7.339,25.975 r90 top
R126 "15R" "RES 0603/1608 RF" 29.75,56.252 r180 bottom
T1 "MABA-007159-000000" MABA-007159-000000 35.783,48.603 r90 bottom
T2 "MABA-007159-000000" MABA-007159-000000 41.498,44.158 r90 bottom
T3 "WBC1-1LB" "WBC Series SMT Mini Wideband Transformers" 35.827,42.683 r270 bottom
U1 "4-18Vin, 3Aout" LGA-16EP 9.485,17.794 r0 top
U2 "AP2210K-5.0TRG1" AP2210K-3.3TRG1 6.084,56.612 r0 top
U3 "ADP125ACPZ-R7" ADP124_125 11.216,27.257 r0 top
U4_U_RF_ANT_L "ADL5910ACPZN-R7" ADL5910 19.194,74.164 r180 bottom (schematic designator U4)
U4_U_RF_ANT_M "ADL5910ACPZN-R7" ADL5910 50.678,75.419 r0 bottom (schematic designator U4)
U5 "LMK04610RTQR" LMK04610 57.693,19.206 r270 bottom locked
U6 "LTC2122IUK#PBF" LTC2122 38.617,28.692 r270 bottom locked
U7 "MCP23017T-E/ML" MCP23017/MCP23S17 12.594,49.62 r0 top
U8 "MCP23017T-E/ML" MCP23017/MCP23S17 24.31,24.929 r270 top locked
U9 "PCA9306DQER" PCA9306 22.179,12.956 r180 bottom
U10 "SN74AXC4T774RSVR" 16-UGFN 42.295,10.579 r90 top
U11 "SN74AXC4T774RSVR" 16-UGFN 36.7,10.579 r90 top
U14 "ADP1741ACPZ-R7" ADI-CP-16-13_M 22.373,16.359 r0 top
U15 "TPS7A8801RTJT" TPS7A88 23.445,34.279 r0 top
U16 "INA226AIDGSR" INA226 21.027,7.594 r180 top
U17 "24LC32AT-I/SN" "8-SOIC 3.9" 11.937,37.279 r0 bottom
U18 "BGA616" INF-SOT343_V 41.23,58.889 r180 bottom
U20 "BGA616" INF-SOT343_V 30.45,60.56 r270 bottom
U22_U_ATT1 "HMC472ALP4E" HMC472ALP4E 24.052,67.621 r180 bottom (schematic designator U22)
U22_U_ATT2 "HMC472ALP4E" HMC472ALP4E 47.438,67.412 r0 bottom (schematic designator U22)
U23 "TXB0304RSVR" TXB0304 35.477,18.364 r90 top
X1 "VG-4513CA122.8800M-GFCT3" VG-4513CA 55.233,45.929 r270 top

## Footprints (in the part's own frame and the unit in brackets; to place one, negate y for a bottom-side part, rotate by r counter-clockwise, add the part's x,y. Pads: shape width x height; smd on the part's side, far side on the other; paste and mask are expansions set on the pad)
"8-SOIC 3.9" [mm] "SOIC, 8-Leads, Body 4,90x3,90mm, Pitch 1,27mm, IPC High Density"
  rect 1.55x0.6 smd: 1(-2.7,1.905) 2(-2.7,0.635) 3(-2.7,-0.635) 4(-2.7,-1.905) 5(2.7,-1.905) 6(2.7,-0.635) 7(2.7,0.635) 8(2.7,1.905)
  silkscreen extent -2.82,-2.45 1.55,2.88, body extent -3,-2.45 3,2.45, height 1.75
16-UGFN [mm] "QFN, 16-Leads, Body 1,80x2,60mm, Pitch 0,40mm, IPC High Density"
  rect 0.7x0.2 smd mask+0.052: 1(-0.75,0.6)
  rect 0.6x0.2 smd mask+0.052: 2(-0.8,0.2) 3(-0.8,-0.2) 4(-0.8,-0.6) 9(0.8,-0.6) 10(0.8,-0.2) 11(0.8,0.2) 12(0.8,0.6)
  rect 0.2x0.6 smd mask+0.052: 5(-0.6,-1.2) 6(-0.2,-1.2) 7(0.2,-1.2) 8(0.6,-1.2) 13(0.6,1.2) 14(0.2,1.2) 15(-0.2,1.2) 16(-0.6,1.2)
  silkscreen extent -1.27,1.58 -1.18,1.67, body extent -0.97,-1.38 0.97,1.38, height 0.55
36900000 [mm] "Shielding Cabinet Clip"
  rect 0.6x0.9 smd: 1(-3.05,0) 1(3.05,0)
  rect 1.5x0.9 smd: 1(-1.65,0) 1(1.65,0)
  rect 1.2x0.9 smd: 1(0,0)
  body extent -3.25,-0.41 3.25,0.41, height 1.28
ADI-CP-16-13_M [mm] "QFN, 16-Leads, Body 4x4mm, Pitch 0.65mm, Thermal Pad 2.5x2.5mm, IPC Low Density"
  oval 0.8x0.25 smd: 1(-2.05,0.975) 2(-2.05,0.325) 3(-2.05,-0.325) 4(-2.05,-0.975) 9(2.05,-0.975) 10(2.05,-0.325) 11(2.05,0.325) 12(2.05,0.975)
  oval 0.25x0.8 smd: 5(-0.975,-2.05) 6(-0.325,-2.05) 7(0.325,-2.05) 8(0.975,-2.05) 13(0.975,2.05) 14(0.325,2.05) 15(-0.325,2.05) 16(-0.975,2.05)
  rect 2.5x2.5 smd: 17(0,0)
  silkscreen extent -2.92,-2.15 2.15,2.15, body extent -2,-2 2,2, height 1
ADL5910 [mm] "16-Lead Lead Frame Chip Scale Package [LFCSP]  3 mm × 3 mm Body and 0.75 mm Package Height  (CP-16-22)"
  oval 0.4x0.23 smd: 1(-1.3,0.75) 2(-1.3,0.25) 3(-1.3,-0.25) 4(-1.3,-0.75) 9(1.3,-0.75) 10(1.3,-0.25) 11(1.3,0.25) 12(1.3,0.75)
  oval 0.23x0.4 smd: 5(-0.75,-1.3) 6(-0.25,-1.3) 7(0.25,-1.3) 8(0.75,-1.3) 13(0.75,1.3) 14(0.25,1.3) 15(-0.25,1.3) 16(-0.75,1.3)
  rect 1.6x1.6 smd: 17(0,0)
  silkscreen extent -2.33,-1.55 1.55,1.55, body extent -1.55,-1.55 1.55,1.55, height 0.8
ADP124_125 [mm] "8-Lead Lead Frame Chip Scale Package [LFCSP_UD]  2 mm × 2 mm Body, Ultra Thin, Dual Lead  (CP-8-10)"
  rect 0.35x0.25 smd: 1(-0.9,0.75) 2(-0.9,0.25) 3(-0.9,-0.25) 4(-0.9,-0.75) 5(0.9,-0.75) 6(0.9,-0.25) 7(0.9,0.25) 8(0.9,0.75)
  rect 1x1.6 smd: 9(0,0)
  silkscreen extent -1.5,-1.2 1.05,1.25, body extent -1.15,-1.05 1.15,1.05, height 0.55
AP2210K-3.3TRG1 [mm] "SOT23, 5-Leads, Body 2.96x2.83mm, Pitch 0.95mm, IPC High Density"
  rect 1x0.7 smd: 1(-1.3,0.95) 2(-1.3,0) 3(-1.3,-0.95) 4(1.3,-0.95) 5(1.3,0.95)
  silkscreen extent -1.42,-1.55 0.45,1.97, body extent -1.5,-1.55 1.5,1.55, height 1.45
"CAP 0201/0603 KK"#1 [mm] "Chip Capacitor, 2-Leads, Body 0.60x0.30mm, IPC High Density"
  rect 0.3x0.32 smd: 1(-0.26,0) 2(0.26,0)
  silkscreen extent -0.58,-0.33 0.58,0.33, body extent -0.3,-0.15 0.3,0.15, height 0.3
"CAP 0201/0603 KK"#2 [mm] "Chip Capacitor, 2-Leads, Body 0.60x0.30mm, IPC High Density"
  rect 0.3x0.32 smd mask+0.062: 1(-0.26,0) 2(0.26,0)
  silkscreen extent -0.58,-0.33 0.58,0.33, body extent -0.3,-0.15 0.3,0.15, height 0.3
"CAP 0402/1005 RF KK" [mm] "Chip Capacitor, 2-Leads, Body 1.02x0.51mm, IPC High Density"
  rect 0.55x0.65 smd: 1(-0.525,0) 2(0.525,0)
  silkscreen extent -0.87,-0.45 0.87,0.45, body extent -0.5,-0.26 0.5,0.26, height 0.52
"CAP 0603/1608 RF" [mm] "Chip Capacitor, 2-Leads, Body 1.60x0.80mm, IPC High Density"
  rect 0.8x0.9 smd: 1(-0.625,0) 2(0.625,0)
  silkscreen extent -1.2,-0.63 1.2,0.63, body extent -0.8,-0.41 0.8,0.41, height 0.82
"CAP 0805/2012 RF" [mm] "Chip Capacitor, 2-Leads, Body 2.00x1.20mm, IPC High Density"
  rect 1.1x1.3 smd: 1(-0.7,0) 2(0.7,0)
  silkscreen extent -1.43,-0.82 1.43,0.82, body extent -1,-0.64 1,0.64, height 1.26